# Altium PCB TouchGFX_SmartPCB_SmartPCB_SmartPCB_SmartPCB_SmartPCB_SmartPCB.PcbDoc
Units mm, origin at the board's own origin, x right, y up, seen from the top; angles counter-clockwise.
Board outline 127 x 102.47 mm, 6 copper layers (Top Layer, SIG, POWER, GND, SIG (Mid4), Bottom Layer), stack 1.231 mm thick; 167 components, 192 nets, 780 pads, 4 vias.
Unrouted connection lines stored in the file: 341.
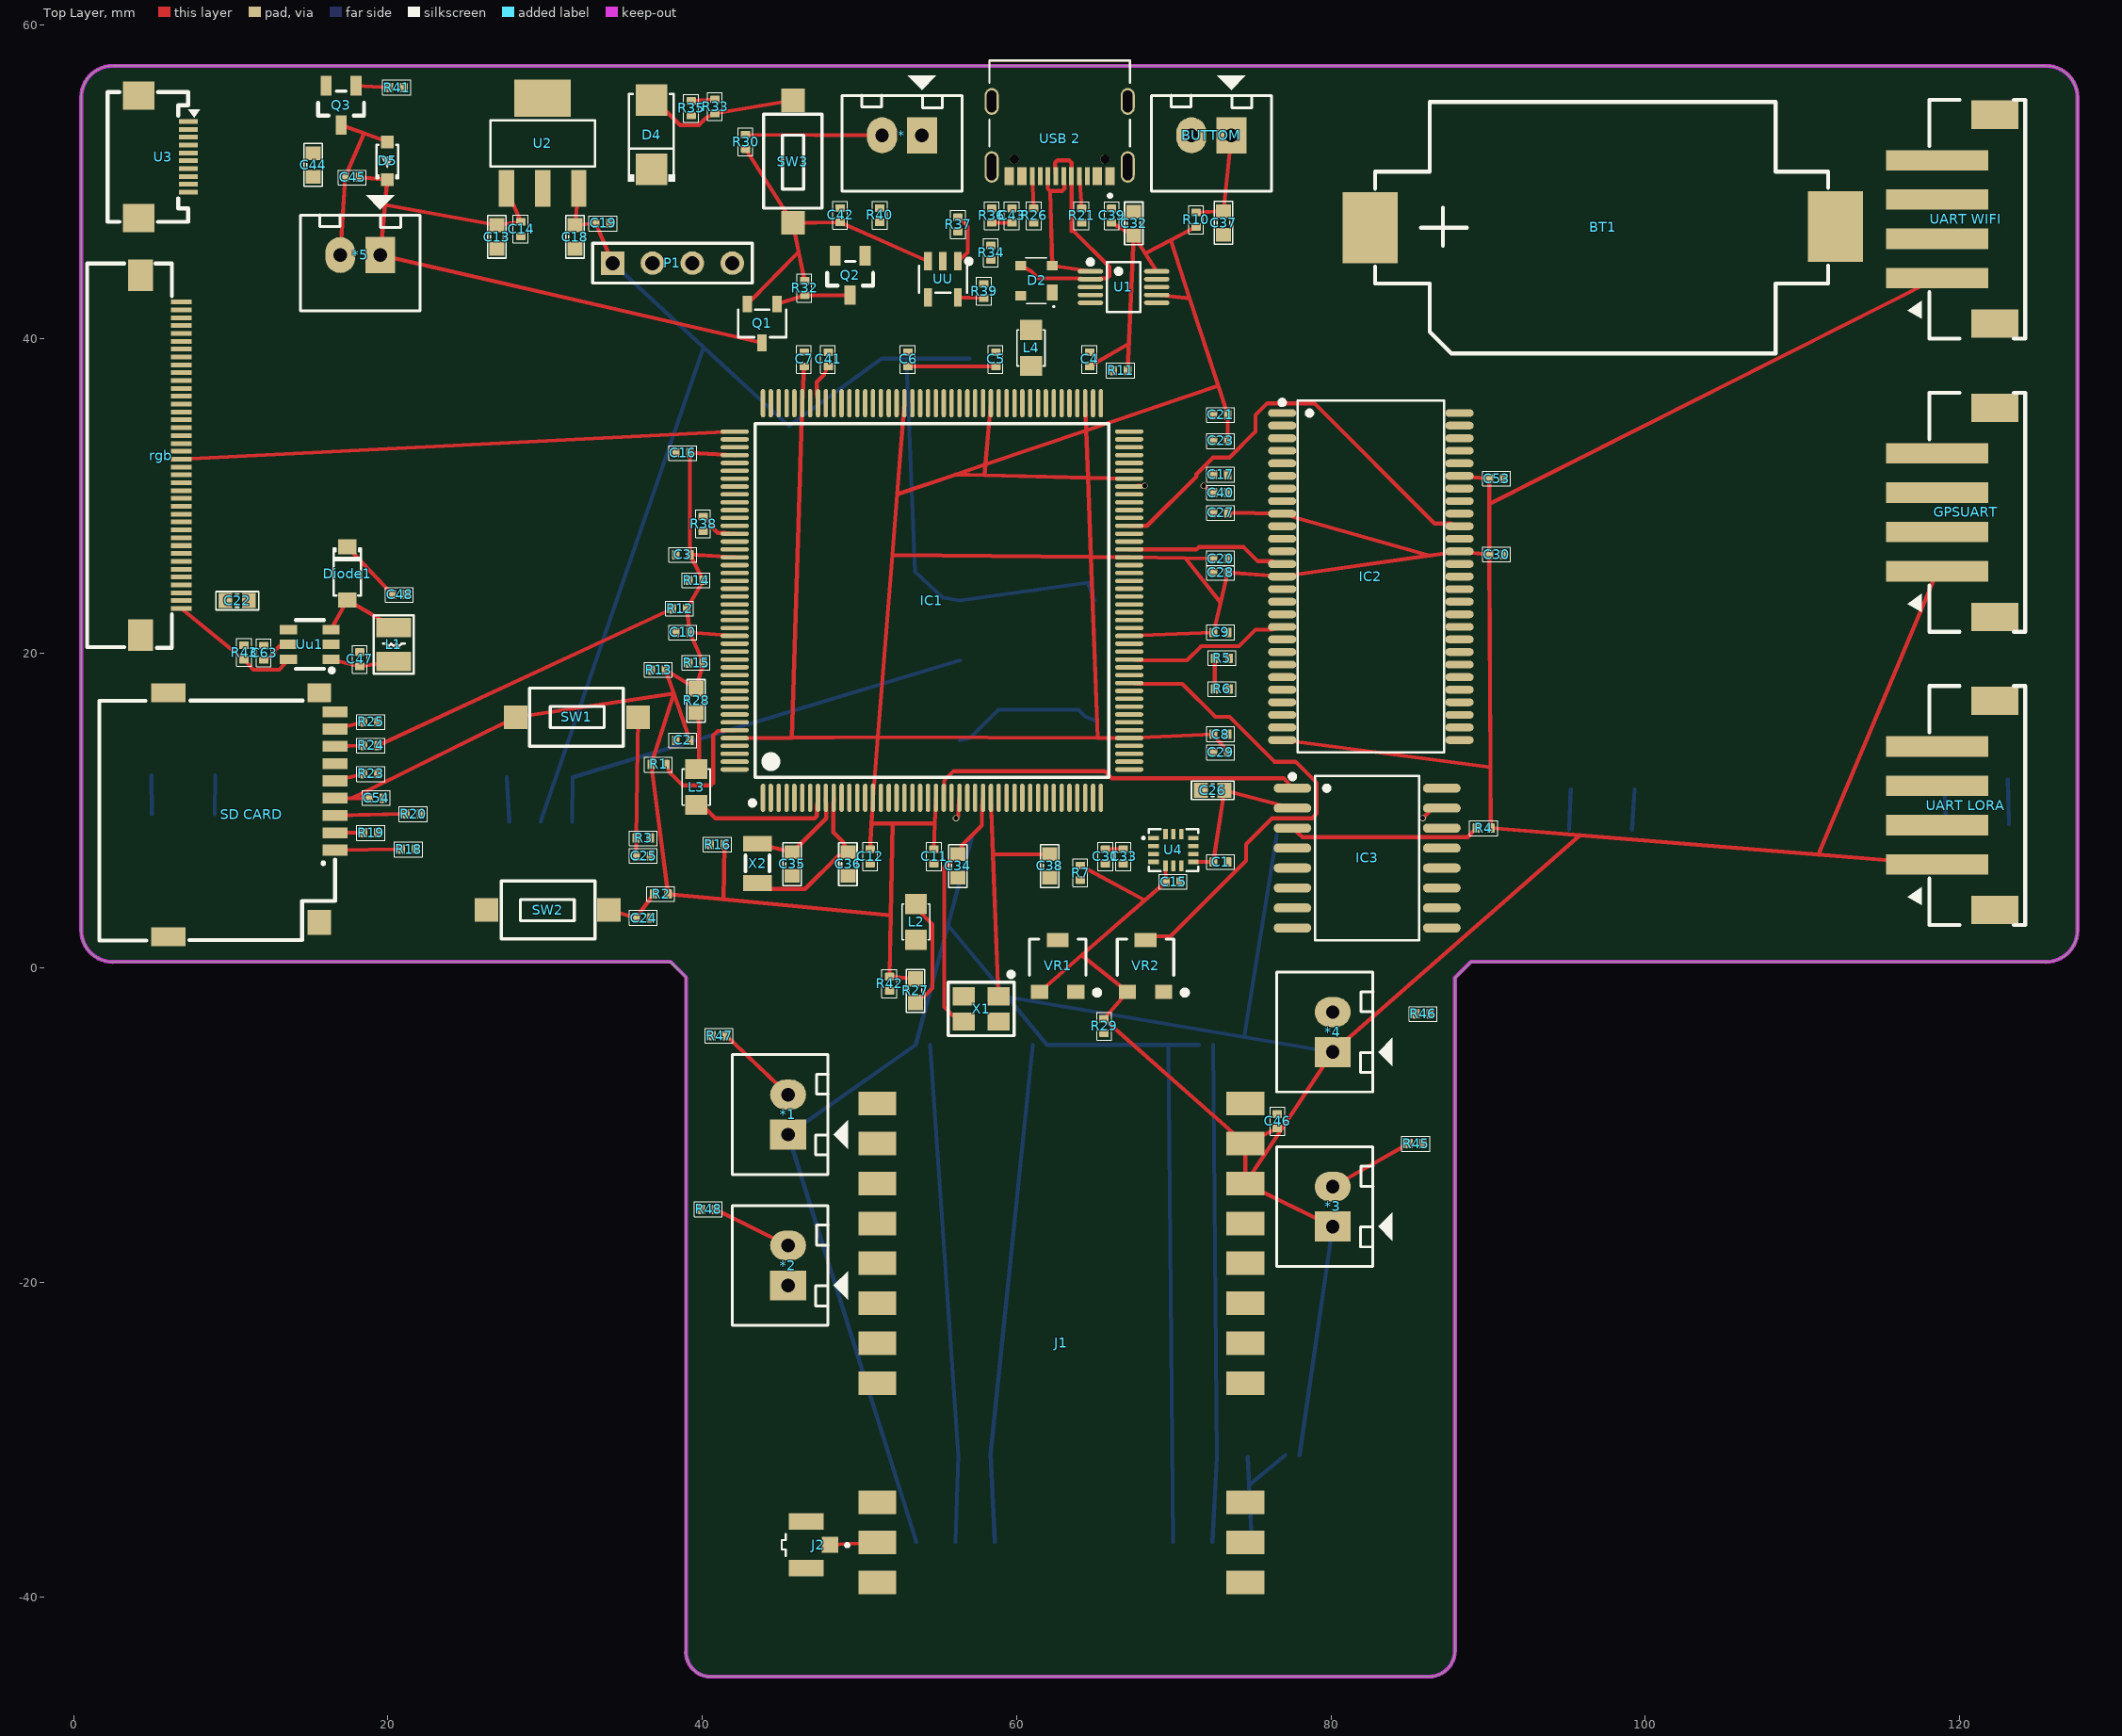
[diagram p0: Top Layer view]
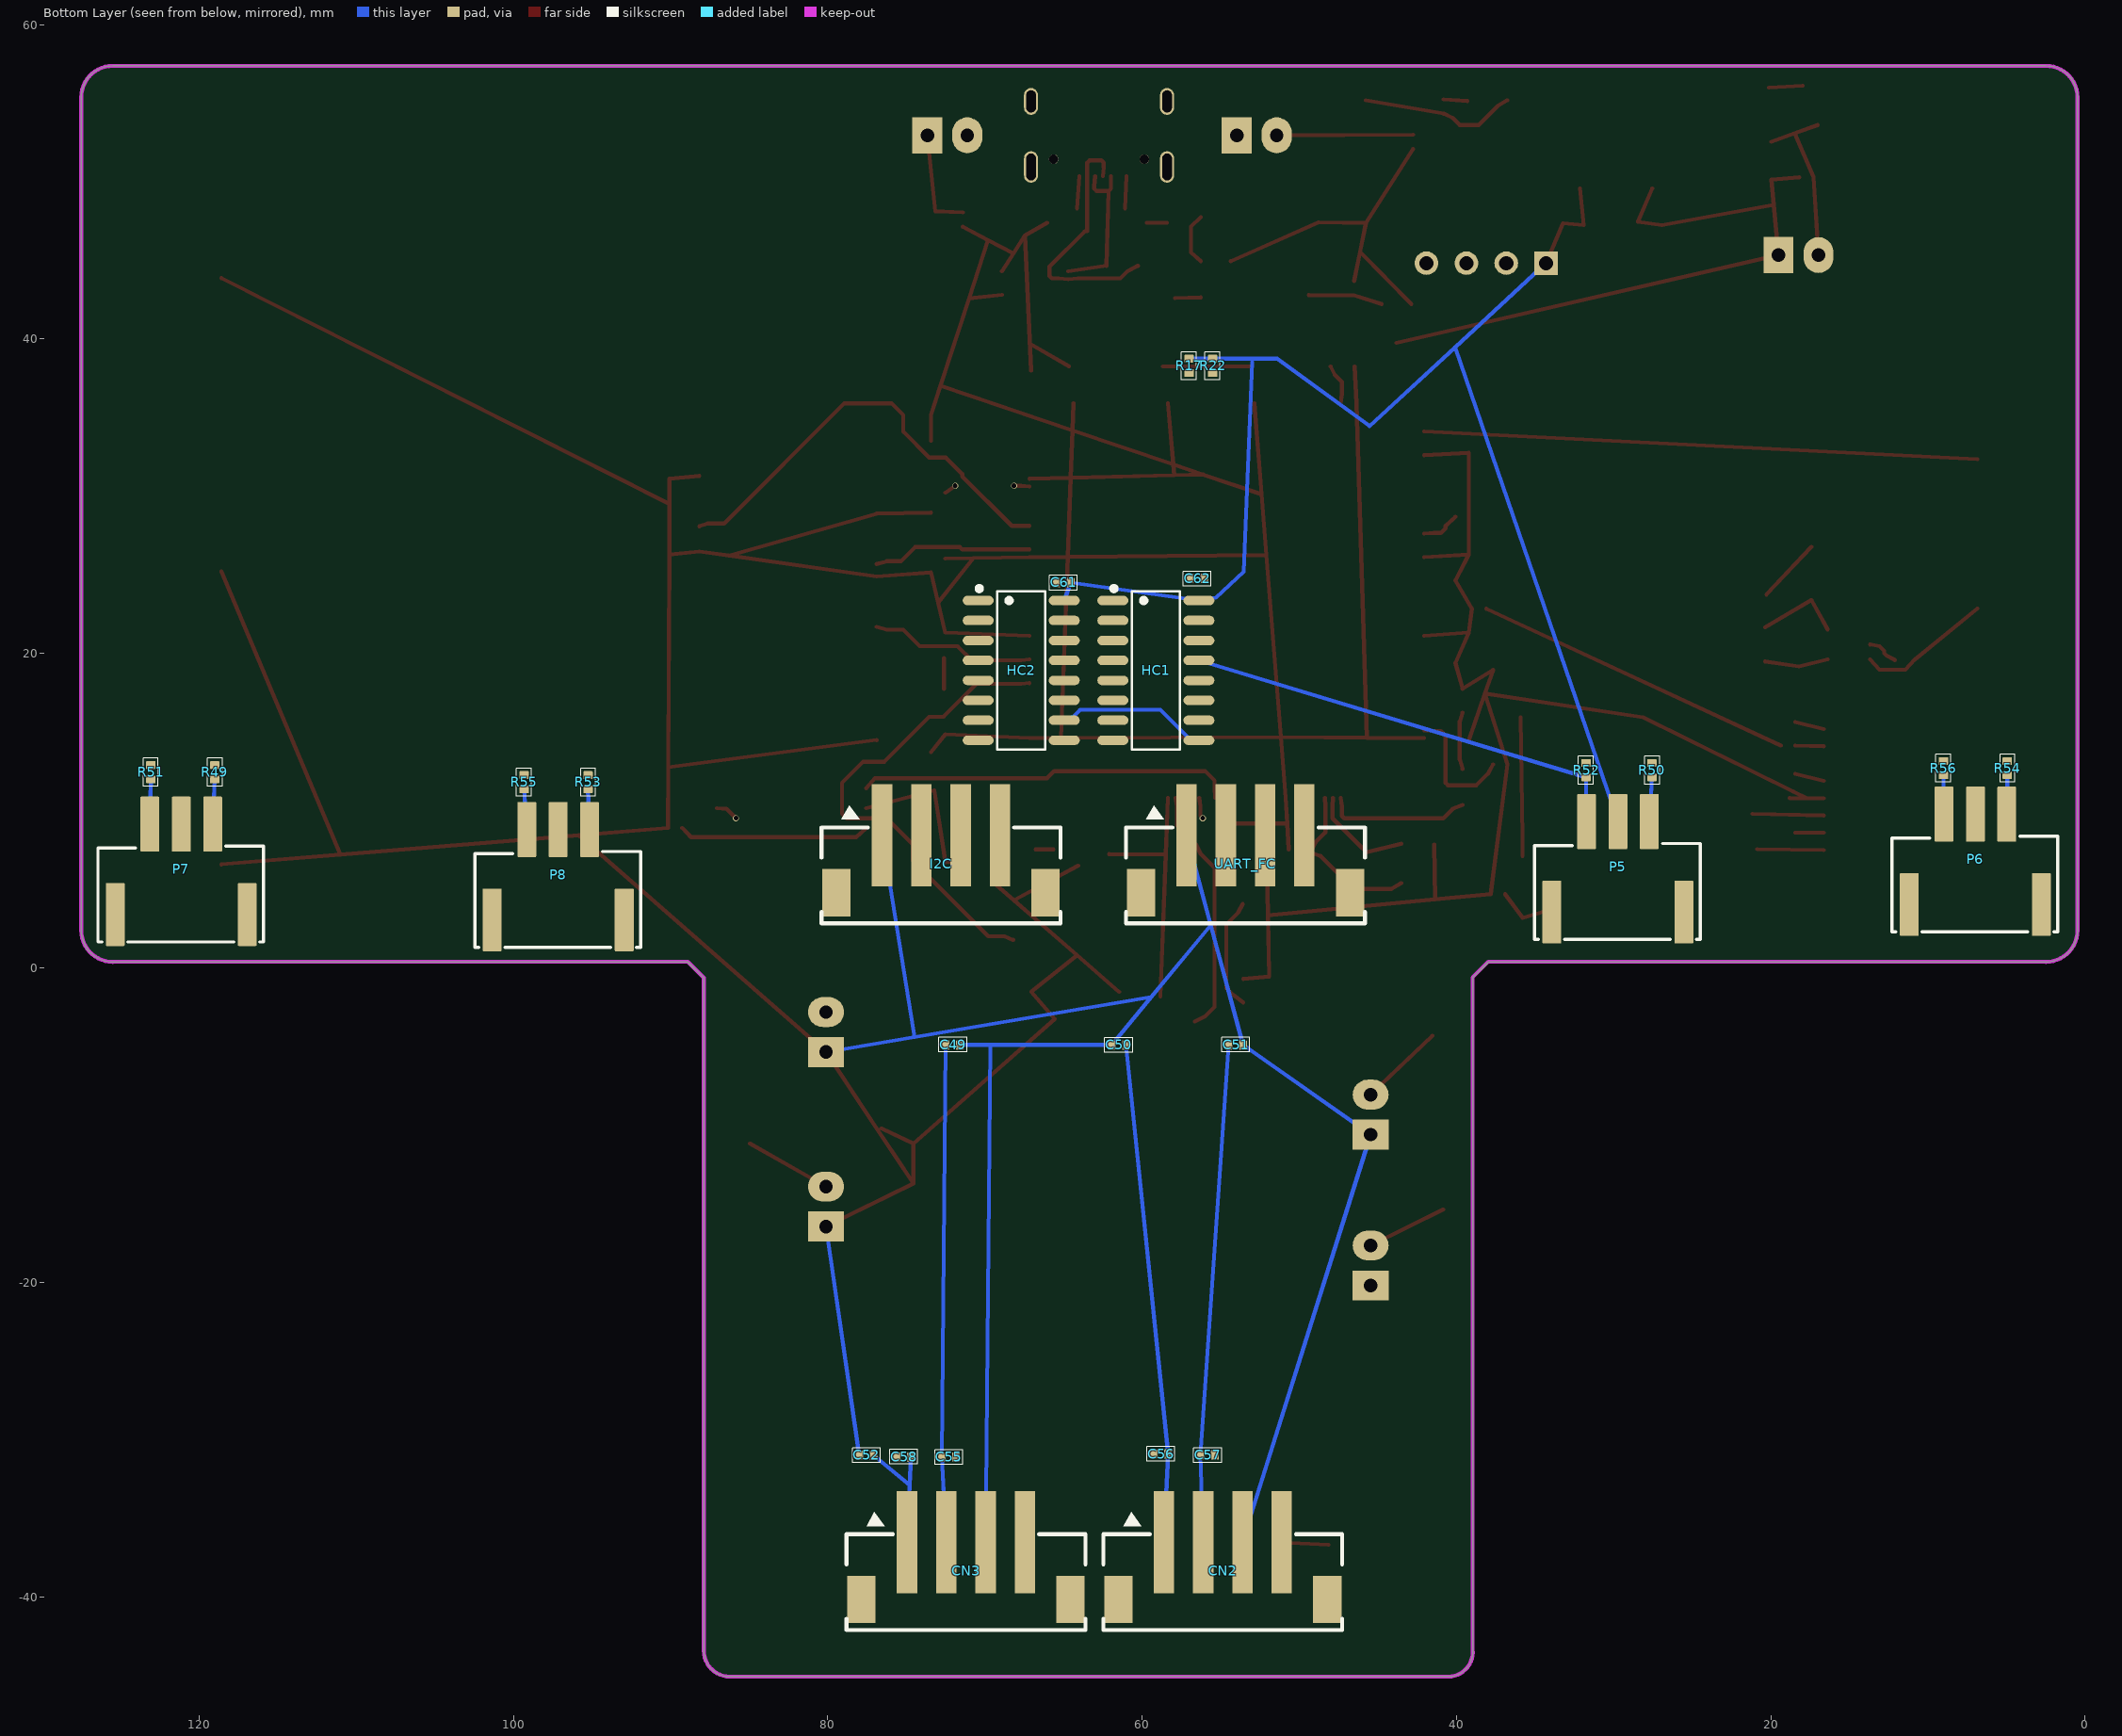
[diagram p1: Bottom Layer view, seen from below]
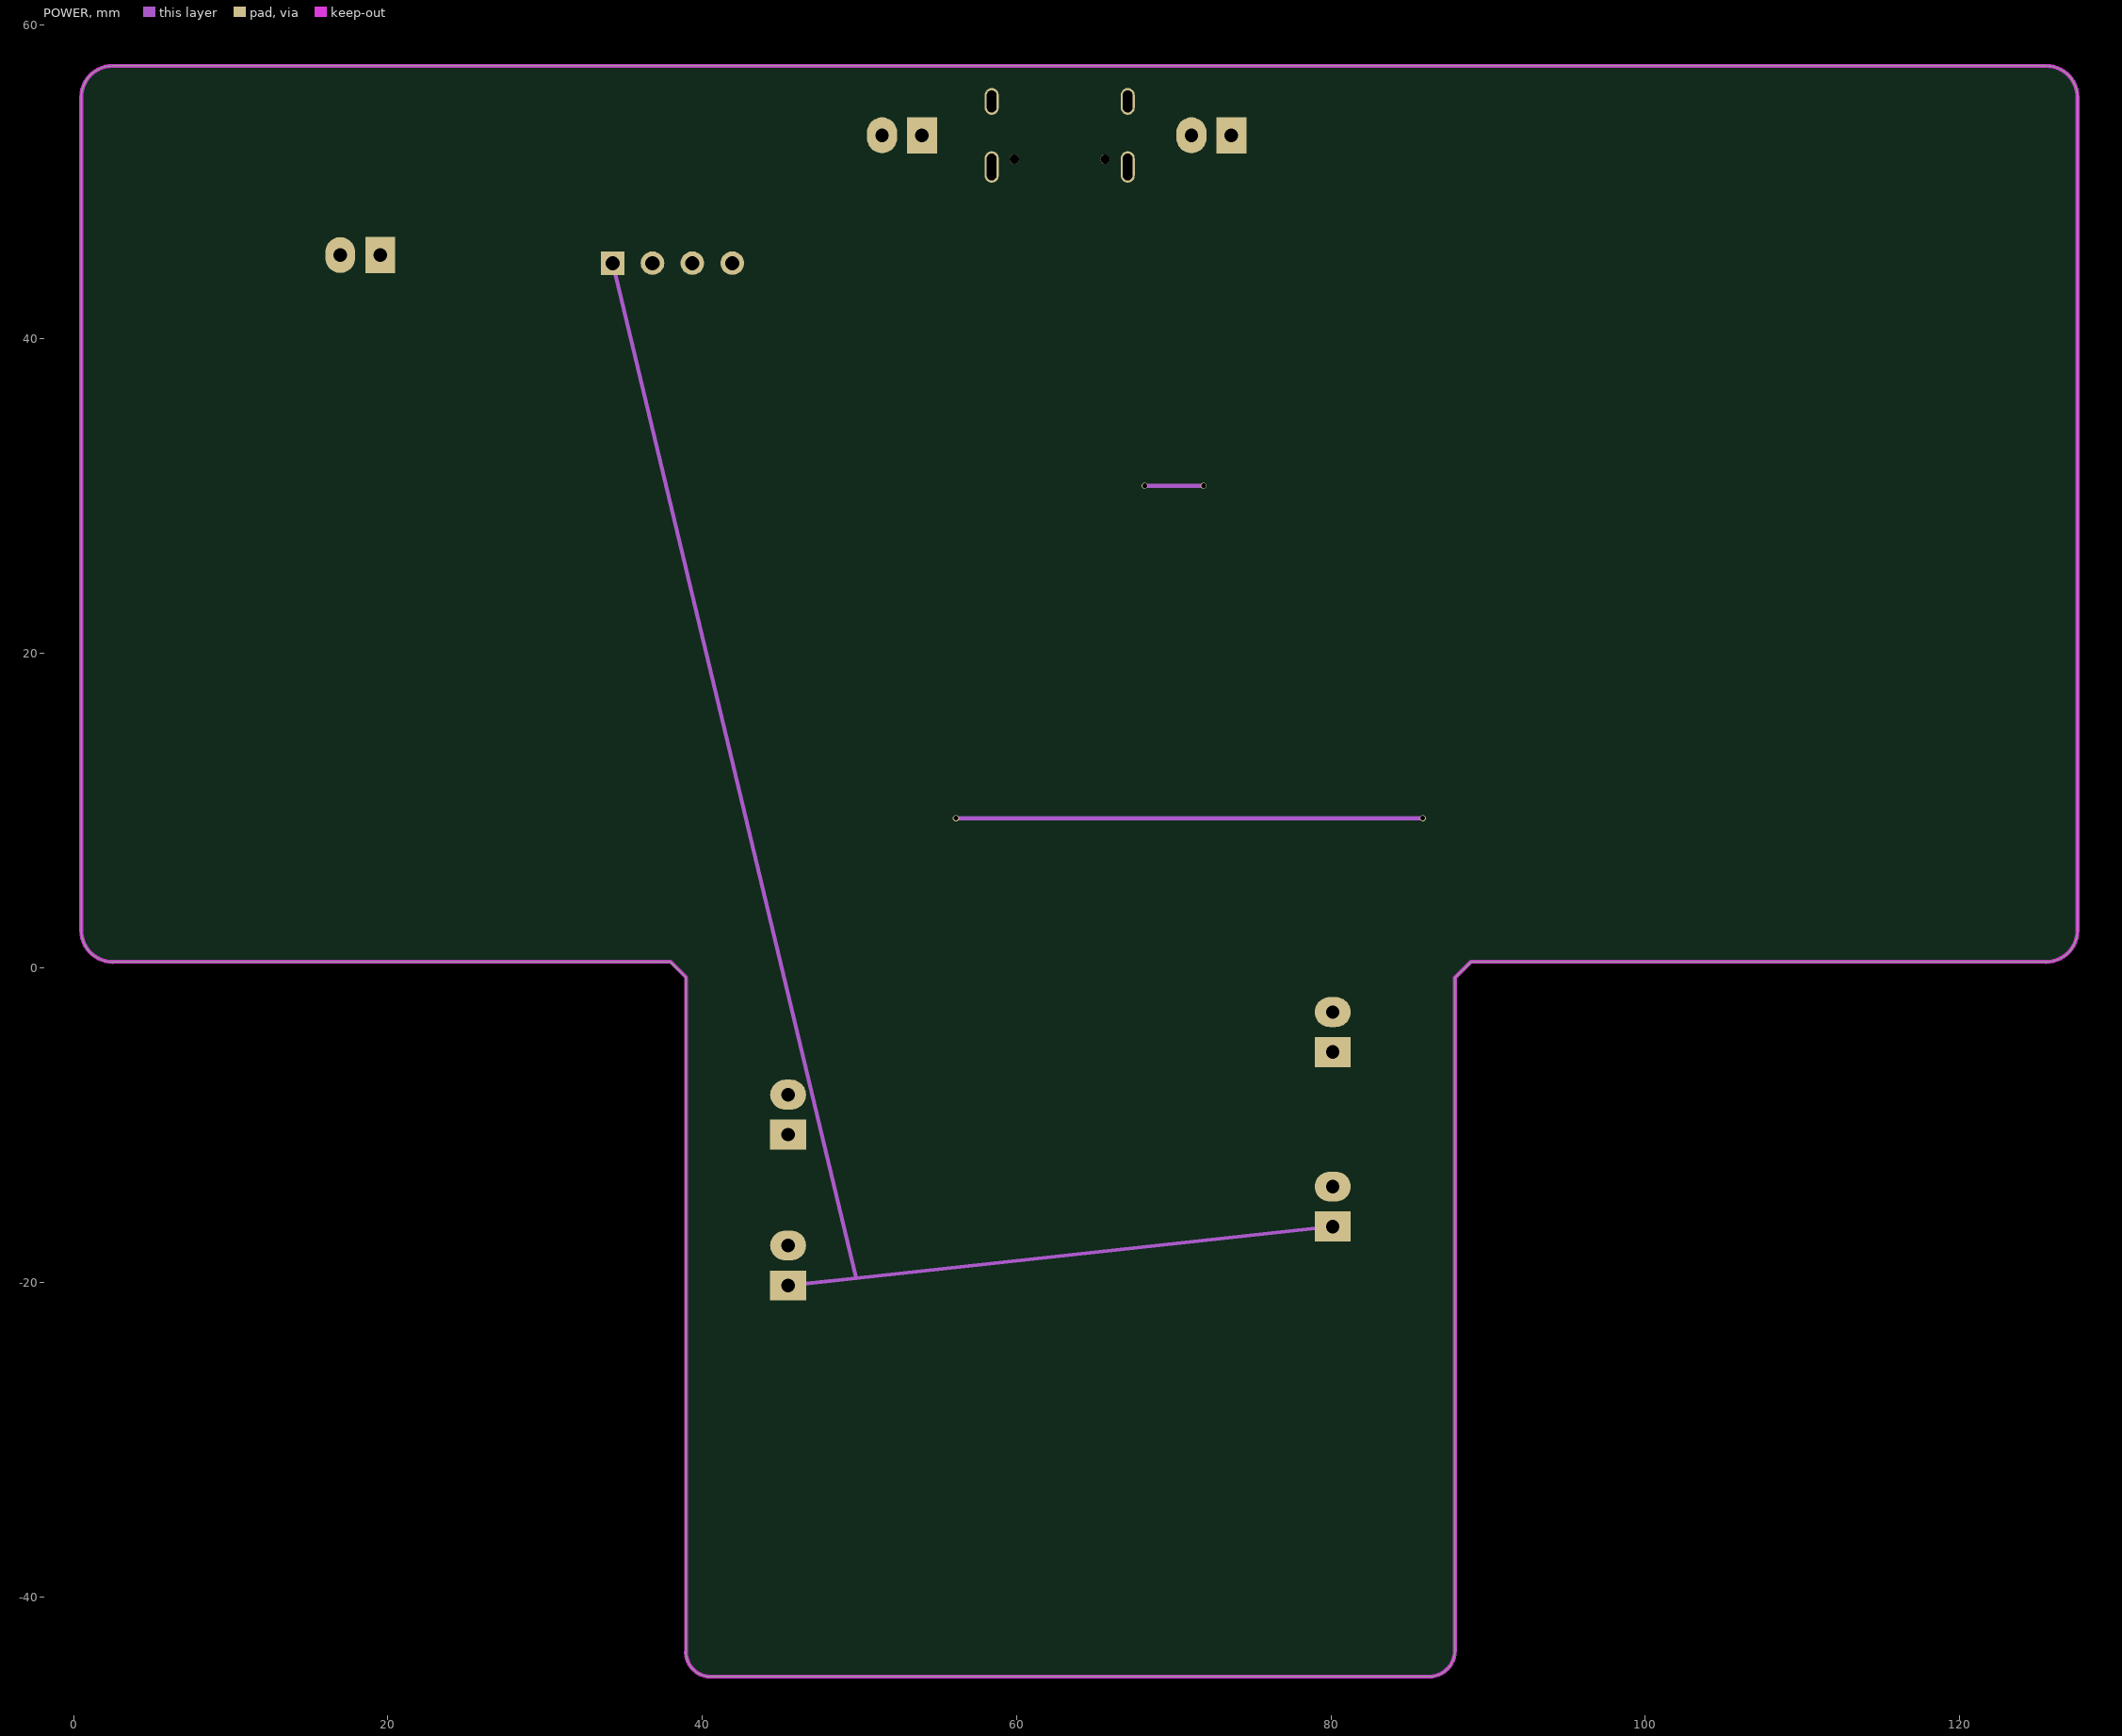
[diagram p2: POWER]

## Layer stack, top to bottom
Top Solder: solder mask 0.0102, Solder Resist, Dk 3.5
Top Layer: signal copper 0.0356
Dielectric 1: core 0.254, FR-4, Dk 4.2
SIG: signal copper 0.036
Dielectric 4: prepreg 0.127, Dk 4.2
POWER: signal copper 0.036
Dielectric 3: core 0.254, Dk 4.2
GND: signal copper 0.036
Dielectric 5: prepreg 0.127, Dk 4.2
SIG (Mid4): signal copper 0.036
Dielectric 2: core 0.254, Dk 4.2
Bottom Layer: signal copper 0.0356
Bottom Solder: solder mask 0.0102, Solder Resist, Dk 3.5

## Board outline
0.489,2.381 ccw(c2.489,2.381) 2.489,0.381 37.973,0.381 38.963,-0.609 38.963,-43.535 ccw(c40.513,-43.535) 40.513,-45.085 86.233,-45.085 ccw(c86.233,-43.434) 87.884,-43.434 87.884,-0.635 88.9,0.381 125.489,0.381 ccw(c125.489,2.381) 127.489,2.381 127.489,55.381 ccw(c125.489,55.381) 125.489,57.381 2.489,57.381 ccw(c2.489,55.381) 0.489,55.381

## Design rules (kind name [scope] priority, off if disabled: settings)
Clearance [All] p1: gap=0.15
PolygonConnect [All] p1: connectstyle=Relief reliefconductorwidth=0.254 reliefentries=4 polygonreliefangle="90 Angle" airgapwidth=0.254
RoutingVias [All] p1: holewidth=0.3 width=0.4 viastyle="Through Hole" minholewidth=0.3 minwidth=0.4 maxholewidth=0 maxwidth=0.4
SolderMaskExpansion [All] p1: expansion=0.102
Width [All] p1: maxlimit=2 minlimit=0.15 preferedwidth=0.254 midlayer3_minwidth=0.254 midlayer3_maxwidth=0.254 midlayer4_minwidth=0.254 midlayer4_maxwidth=0.254 minimp=50.000000 maximp=50.000000 favimp=50.000000
30 further rules are at their usual default settings.

## Components (designator, comment, footprint, x,y, rotation, side; value= is the part's Value field where it differs from the comment)
* "BAT1S" CON2 53.975,52.959 r0 top
*1 "BAT1S" CON2 45.46,-10.605 r270 top
*2 "BAT1S" CON2 45.46,-20.205 r270 top
*3 "BAT1S" CON2 80.11,-16.455 r270 top
*4 "BAT1S" CON2 80.11,-5.355 r270 top
*5 "BAT1S" CON2 19.51,45.345 r0 top
BT1 "PIN2032" BAT-SMD_BS-06-B4AA012 97.282,47.117 r0 top
BUTTOM "BAT1S" CON2 73.66,52.959 r0 top
C1 "100n" "Cap 0402" 72.997,6.731 r0 top
C2 "100n" "Cap 0402" 38.735,14.478 r180 top
C3 "100n" "Cap 0402" 38.735,26.289 r180 top
C4 "100n" "Cap 0402" 64.643,38.735 r90 top
C5 "100n" "Cap 0402" 58.674,38.735 r90 top
C6 "100n" "Cap 0402" 53.086,38.735 r90 top
C7 "100n" "Cap 0402" 46.482,38.735 r90 top
C8 "100n" "Cap 0402" 72.997,14.859 r0 top
C9 "100n" "Cap 0402" 72.997,21.336 r0 top
C10 "100n" "Cap 0402" 38.735,21.336 r180 top
C11 "100n" "Cap 0402" 54.737,7.062 r270 top
C12 "100n" "Cap 0402" 50.673,7.062 r270 top
C13 "22u" "Cap 0603" 26.916,46.502 r90 top
C14 "100n" "Cap 0402" 28.459,47.028 r90 top
C15 "100n" "Cap 0402" 69.977,5.461 r0 top
C16 "100n" "Cap 0402" 38.735,32.766 r180 top
C17 "100n" "Cap 0402" 72.997,31.369 r0 top
C18 "22u" "Cap 0603" 31.888,46.502 r90 top
C19 "100n" "Cap 0402" 33.655,47.371 r180 top
C20 "100n" "Cap 0402" 72.997,26.035 r0 top
C21 "100n" "Cap 0402" 72.947,35.179 r180 top
C22 "10u" "Cap 0603" 10.414,23.368 r0 top
C23 "100n" "Cap 0402" 72.947,33.528 r180 top
C24 "100n" "Cap 0402" 36.273,3.175 r0 top
C25 "100n" "Cap 0402" 36.273,7.112 r0 top
C26 "10u" "Cap 0603" 72.471,11.303 r0 top
C27 "100n" "Cap 0402" 72.947,28.956 r180 top
C28 "100n" "Cap 0402" 72.947,25.146 r180 top
C29 "100n" "Cap 0402" 72.947,13.716 r180 top
C30 "100n" "Cap 0402" 90.551,26.289 r0 top
C31 "2.2u" "Cap 0402" 65.64,7.062 r270 top
C32 "100n" "Cap 0603" 67.437,47.354 r90 top
C33 "100n" "Cap 0402" 66.783,7.062 r270 top
C34 "1u" "Cap 0603" 56.261,6.477 r270 top
C35 "1u" "Cap 0603" 45.72,6.596 r270 top
C36 "1u" "Cap 0603" 49.276,6.596 r270 top
C37 "100n" "Cap 0603" 73.144,47.391 r90 top
C38 "1u" "Cap 0603" 62.103,6.477 r270 top
C39 "?" "Cap 0402" 66.04,47.829 r270 top
C40 "2.2u" "Cap 0402" 72.997,30.226 r0 top
C41 "2.2u" "Cap 0402" 48.006,38.735 r90 top
C42 "100n" "Cap 0402" 48.776,47.904 r90 top
C43 "100n" "Cap 0402" 59.701,47.88 r90 top
C44 "10u" "Cap 0603" 15.232,51.074 r90 top
C45 "100n" "Cap 0402" 17.71,50.295 r180 top
C46 "100n" "Cap 0402" 76.581,-9.779 r270 top
C47 "4.7u" "Cap 0402" 18.206,19.607 r270 top
C48 "2.2uF" "Cap 0402" 20.701,23.749 r180 top
C49 "102" "Cap 0402" 72.01,-4.905 r180 bottom
C50 "102" "Cap 0402" 61.51,-4.905 r0 bottom
C51 "102" "Cap 0402" 54.01,-4.905 r180 bottom
C52 "102" "Cap 0402" 77.56,-31.005 r0 bottom
C53 "100n" "Cap 0402" 90.551,31.115 r0 top
C54 "100n" "Cap 0402" 19.276,10.795 r0 top
C55 "102" "Cap 0402" 72.314,-31.115 r0 bottom
C56 "102" "Cap 0402" 58.773,-30.93 r180 bottom
C57 "102" "Cap 0402" 55.852,-30.988 r0 bottom
C58 "102" "Cap 0402" 75.133,-31.115 r180 bottom
C61 "100n" "Cap 0402" 65.024,24.511 r0 bottom
C62 "100n" "Cap 0402" 56.515,24.765 r0 bottom
C63 "200n" "Cap 0402" 12.11,20.066 r90 top
CN2 "hx 2.54-4p lt" CONN-SMD_4P-P2.50_HX-2.54-4P-LT 54.864,-38.354 r180 bottom
CN3 "hx 2.54-4p lt" CONN-SMD_4P-P2.50_HX-2.54-4P-LT 71.201,-38.354 r180 bottom
D2 "PRTR5V0U2X,215" SOT-143_L2.9-W1.3-P1.92-LS2.3-BR 61.341,43.688 r0 top
D4 "ss34_c8678" SMA_L4.3-W2.6-LS5.2-RD 36.76,52.995 r90 top
D5 "cus10s40.h3f" SOD-323_L1.7-W1.3-LS2.5-RD 19.96,51.345 r90 top
Diode1 "MBR0540T1G" SOD-123_L2.8-W1.8-LS3.7-RD 17.41,25.095 r270 top
GPSUART "hx 2.54-4p lt" CONN-SMD_4P-P2.50_HX-2.54-4P-LT 120.396,28.979 r90 top
HC1 "74hc165d,653" SOIC-16_L9.9-W3.9-P1.27-LS6.0-BL 59.124,18.923 r270 bottom
HC2 "74hc165d,653" SOIC-16_L9.9-W3.9-P1.27-LS6.0-BL 67.691,18.923 r270 bottom
I2C "hx 2.54-4p lt" CONN-SMD_4P-P2.50_HX-2.54-4P-LT 72.791,6.604 r180 bottom
IC1 "STM32H743IIT6" STM32H7 54.61,23.368 r0 top
IC2 "w9825g6kh-6" TSOP-54_L22.2-W10.2-P0.80-LS11.8-BL 82.531,24.892 r270 top
IC3 "w25q256jvfiq" SOIC-16_L10.3-W7.5-P1.27-LS10.3-BL 82.296,6.985 r270 top
J1 "E22-400M30S" E22-400M30S 50.849,-44.556 r0 top
J2 "20279-001E-03" IPEX_20279-001E-03 46.608,-36.703 r90 top
L1 "10uH" INDC2520X10N 20.365,20.574 r90 top
L2 "LED 0805" LED-0805-Yellow 53.594,4.064 r270 top
L3 "LED 0805" LED-0805-Yellow 39.61,12.645 r270 top
L4 "LED 0805" LED-0805-Yellow 60.91,38.295 r90 top
P1 "Header 4" HDR1X4 34.29,44.831 r0 top
P5 "HEADER 3" JST2MM-3P 31.727,9.306 r0 bottom
P6 "HEADER 3" JST2MM-3P 8.985,9.779 r0 bottom
P7 "HEADER 3" JST2MM-3P 123.126,9.142 r0 bottom
P8 "HEADER 3" JST2MM-3P 99.146,8.798 r0 bottom
Q1 "irlml6402trpbf_c2593" SOT-23-3_L2.9-W1.6-P1.90-LS2.8-BR 43.81,40.995 r90 top
Q2 "2n3904s-rtk/ps_c18536" SOT-23-3_L2.9-W1.3-P1.90-LS2.4-TR 49.403,44.045 r90 top
Q3 "2n3904s-rtk/ps_c18536" SOT-23-3_L2.9-W1.3-P1.90-LS2.4-TR 17.018,54.864 r90 top
R1 "4K7" "RES 0402" 37.21,12.945 r180 top
R2 "10k" "RES 0402" 37.36,4.695 r0 top
R3 "10k" "RES 0402" 36.248,8.255 r180 top
R4 "10k" "RES 0402" 89.71,8.895 r180 top
R5 "4k7" "RES 0402" 73.06,19.695 r0 top
R6 "10k" "RES 0402" 73.06,17.745 r180 top
R7 "600ohm" "RES 0402" 64.06,6.045 r90 top
R10 "10k" "RES 0402" 71.41,47.595 r270 top
R11 "4k7" "RES 0402" 66.61,37.995 r0 top
R12 "4k7" "RES 0402" 38.56,22.845 r0 top
R13 "4k7" "RES 0402" 37.21,18.945 r0 top
R14 "4k7" "RES 0402" 39.61,24.645 r0 top
R15 "4k7" "RES 0402" 39.61,19.395 r0 top
R16 "4k7" "RES 0402" 40.96,7.845 r0 top
R17 "10k" "RES 0402" 57.01,38.295 r90 bottom
R18 "20" "RES 0402" 21.31,7.545 r180 top
R19 "20" "RES 0402" 18.91,8.595 r180 top
R20 "20" "RES 0402" 21.61,9.795 r180 top
R21 "20" "RES 0402" 64.135,47.854 r90 top
R22 "10k" "RES 0402" 55.51,38.295 r90 bottom
R23 "20" "RES 0402" 18.91,12.345 r180 top
R24 "20" "RES 0402" 18.91,14.145 r180 top
R25 "20" "RES 0402" 18.91,15.645 r180 top
R26 "20" "RES 0402" 61.087,47.854 r270 top
R27 "5K1" "RES 0603" 53.56,-1.455 r270 top
R28 "5K1" "RES 0603" 39.61,16.995 r270 top
R29 "0ohm" "RES 0402" 65.56,-3.705 r270 top
R30 "0OHM" "RES 0402" 42.76,52.545 r90 top
R32 "4K7" "RES 0402" 46.51,43.245 r90 top
R33 "4K7" "RES 0402" 40.81,54.795 r90 top
R34 "4K7" "RES 0402" 58.36,45.495 r90 top
R35 "4K7" "RES 0402" 39.294,54.684 r90 top
R36 "4K7" "RES 0402" 58.409,47.854 r270 top
R37 "4K7" "RES 0402" 56.26,47.295 r270 top
R38 "4K7" "RES 0402" 40.06,28.245 r90 top
R39 "4K7" "RES 0402" 57.912,43.053 r270 top
R40 "4K7" "RES 0402" 51.285,47.879 r270 top
R41 "4K7" "RES 0402" 20.56,55.995 r0 top
R42 "4K7" "RES 0402" 51.91,-1.005 r90 top
R43 "3.3ohm" "RES 0402" 10.84,20.066 r270 top
R45 "4K7" "RES 0402" 85.397,-11.176 r180 top
R46 "4K7" "RES 0402" 85.852,-2.921 r180 top
R47 "4K7" "RES 0402" 41.074,-4.318 r0 top
R48 "4K7" "RES 0402" 40.386,-15.367 r0 top
R49 "4K7" "RES 0402" 118.999,12.446 r270 bottom
R50 "4K7" "RES 0402" 27.559,12.573 r270 bottom
R51 "4K7" "RES 0402" 123.063,12.446 r90 bottom
R52 "4K7" "RES 0402" 31.75,12.573 r90 bottom
R53 "4K7" "RES 0402" 95.25,11.811 r270 bottom
R54 "4K7" "RES 0402" 4.953,12.7 r270 bottom
R55 "4K7" "RES 0402" 99.314,11.811 r90 bottom
R56 "4K7" "RES 0402" 9.017,12.7 r90 bottom
rgb "FPC_40P" FPC-SMD_P0.50-40P_FGS-XJ-H2.0 5.558,32.61 r90 top
"SD CARD" "TF PUSH" TF-SMD_TF-PUSH 11.336,9.743 r270 top
SW1 "switch" SW-SMD_L6.1-W3.5-LS8.0 32.11,15.945 r180 top
SW2 "switch" SW-SMD_L6.1-W3.5-LS8.0 30.08,3.683 r0 top
SW3 "switch" SW-SMD_L6.1-W3.5-LS8.0 45.76,51.195 r90 top
U1 "CH340E" MSOP-10 66.802,43.307 r270 top
U2 "mcp1826s-3302e/db" SOT-223-3_L6.7-W3.7-P2.30-LS7.0-BR 29.845,52.451 r270 top
U3 "fpc 0.5-10p hyh2.0" FPC-SMD_10P-P0.50_FPC-0.5-10P-HYH2.0 5.715,51.59 r270 top
U4 "bmi260" LGA-14_L3.0-W2.5-P0.50-TL 69.977,7.493 r0 top
"UART LORA" "hx 2.54-4p lt" CONN-SMD_4P-P2.50_HX-2.54-4P-LT 120.396,10.333 r90 top
"UART WIFI" "hx 2.54-4p lt" CONN-SMD_4P-P2.50_HX-2.54-4P-LT 120.396,47.625 r90 top
UART_FC "hx 2.54-4p lt" CONN-SMD_4P-P2.50_HX-2.54-4P-LT 53.424,6.604 r180 bottom
"USB 2" "USB_TYPE-C-31-M-12_1" HRO_TYPE-C-31-M-12 62.738,55.118 r180 top
UU "LTC4054ES5-4.2" SACPIN 55.306,43.804 r180 top
Uu1 "TPS61165DBVR" SOT-23-6_L2.9-W1.6-P0.95-LS2.8-BR 15.031,20.574 r0 top
VR1 "PVG3A200C01R00" TRIM_PVG3A200C01R00 62.611,0.127 r0 top
VR2 "PVG3A200C01R00" TRIM_PVG3A200C01R00 68.199,0.127 r0 top
X1 "25MHz" CRYSTAL-SMD_4P-L3.2-W2.5-BL 57.76,-2.655 r180 top
X2 "q13fc13500004_c32346" FC-135R_L3.2-W1.5 43.51,6.645 r90 top

## Footprints (in the part's own frame and the unit in brackets; to place one, negate y for a bottom-side part, rotate by r counter-clockwise, add the part's x,y. Pads: shape width x height; smd on the part's side, far side on the other; paste and mask are expansions set on the pad)
BAT-SMD_BS-06-B4AA012 [mm]
  rect 3.5x4.501 smd: 1(-14.801,-0.03) 2(14.798,0.033)
  silkscreen extent -14.48,-8.03 14.35,7.97, body extent -16.03,-9.65 16.29,9.4, height 6.02
"Cap 0402" [mm]
  rrect20% 0.49x0.6 smd: 1(-0.48,0) 2(0.43,0)
  silkscreen extent -0.91,-0.46 0.86,0.48, body extent -0.53,-0.25 0.47,0.25, height 0.5
"Cap 0603" [mm]
  rect 0.889x0.95 smd mask+0.076: 1(-0.758,-0.008) 2(0.742,-0.008)
  silkscreen extent -1.35,-0.59 1.36,0.58, body extent -0.77,-0.41 0.83,0.39, height 0.78
CON2 [mil] "CON2"
  rect 75x90 hole 34: 1(0,0)
  oval 75x90 hole 34: 2(-100,0)
  silkscreen extent -200,-140 100,150, body extent -168,-107 68,70, height 236
CONN-SMD_4P-P2.50_HX-2.54-4P-LT [mm]
  rect 1.3x6.5 smd paste+0 mask+0.051: 1(-3.749,1.826) 2(-1.25,1.826) 3(1.25,1.826) 4(3.749,1.826)
  rect 1.801x3 smd paste+0 mask+0.051: 5(6.65,-1.824) 6(-6.65,-1.824)
  silkscreen extent -7.6,-3.77 7.6,3.72, body extent -7.37,-6.14 7.63,3.86, height 6.12
CRYSTAL-SMD_4P-L3.2-W2.5-BL [mm]
  rect 1.4x1.15 smd: 1(-1.082,-0.838) 2(1.118,-0.838) 3(1.118,0.762) 4(-1.082,0.762)
  silkscreen extent -2.08,-2.39 2.12,1.66, body extent -1.58,-1.29 1.62,1.21, height 0.61
E22-400M30S [mm]
  rect 2.4x1.5 smd: 1-GND(23.7,5.46) 2-GND(23.7,8) 3-GND(23.7,10.54) 4-GND(23.7,18.14) 5-GND(23.7,20.68) 6-RXEN(23.7,23.22) 7-TXEN(23.7,25.76) 8-DIO2(23.7,28.3) 9-VCC(23.7,30.84) 10-VCC(23.7,33.38) 11-GND(23.7,35.92) 12-GND(0.3,35.92) 13-DIO1(0.3,33.38) 14-BUSY(0.3,30.84) 15-NRESET(0.3,28.3) 16-MISO(0.3,25.76) 17-MOSI(0.3,23.22) 18-SCK(0.3,20.68) 19-NSS(0.3,18.14) 20-GND(0.3,10.54) 21-ANT(0.3,8) 22-GND(0.3,5.46)
  body extent -0.06,-0.02 23.94,38.48, height 3.97
FC-135R_L3.2-W1.5 [mm]
  rect 1.001x1.801 smd: 1(-1.252,0) 2(1.25,0)
  silkscreen extent -0.51,-0.76 0.51,0.76, body extent -1.6,-0.75 1.6,0.75, height 0.65
FPC-SMD_10P-P0.50_FPC-0.5-10P-HYH2.0 [mil]
  rect 11.8x47.2 smd paste+0 mask+2: 1(-88.6,62) 2(-68.9,62) 3(-49.2,62) 4(-29.5,62) 5(-9.9,62) 6(9.8,62) 7(29.5,62) 8(49.2,62) 9(68.9,62) 10(88.6,62)
  rect 70.9x78.7 smd paste+0 mask+2: 11(153.5,-62) 12(-153.6,-62)
  silkscreen extent -162,-140 162,92, body extent -138,-85 138,65, height 43
FPC-SMD_P0.50-40P_FGS-XJ-H2.0 [mm]
  rect 0.3x1.3 smd paste+0 mask+0.05: 1(-9.75,-1.3) 2(-9.25,-1.3) 3(-8.75,-1.3) 4(-8.25,-1.3) 5(-7.75,-1.3) 6(-7.25,-1.3) 7(-6.75,-1.3) 8(-6.25,-1.3) 9(-5.75,-1.3) 10(-5.25,-1.3) 11(-4.75,-1.3) 12(-4.25,-1.3) 13(-3.75,-1.3) 14(-3.25,-1.3) 15(-2.75,-1.3) 16(-2.25,-1.3) 17(-1.75,-1.3) 18(-1.25,-1.3) 19(-0.75,-1.3) 20(-0.25,-1.3) 21(0.25,-1.3) 22(0.75,-1.3) 23(1.25,-1.3) 24(1.75,-1.3) 25(2.25,-1.3) 26(2.75,-1.3) 27(3.25,-1.3) 28(3.75,-1.3) 29(4.25,-1.3) 30(4.75,-1.3) 31(5.25,-1.3) 32(5.75,-1.3) 33(6.25,-1.3) 34(6.75,-1.3) 35(7.25,-1.3) 36(7.75,-1.3) 37(8.25,-1.3) 38(8.75,-1.3) 39(9.25,-1.3) 40(9.75,-1.3)
  rect 2x1.6 smd: 41(11.45,1.3) 42(-11.45,1.3)
  silkscreen extent -12.25,-0.7 12.2,4.7, body extent -12.03,-2.64 12.03,3.3, height 2.63
HDR1X4 [mm] "Connector; Header; 4 Position"
  rect 1.5x1.5 hole 0.9: 1(0,0)
  round 1.5 hole 0.9: 2(2.54,0) 3(5.08,0) 4(7.62,0)
  silkscreen extent -1.27,-1.27 8.89,1.27
HRO_TYPE-C-31-M-12 [mm]
  rect 0.6x1.14 smd mask+0.05: A1_B12(-3.2,4.75) A4_B9(-2.4,4.75) B1_A12(3.2,4.75) B4_A9(2.4,4.75)
  rect 0.3x1.14 smd mask+0.05: A5(-1.25,4.75) A6(-0.25,4.75) A7(0.25,4.75) A8(1.25,4.75) B5(1.75,4.75) B6(0.75,4.75) B7(-0.75,4.75) B8(-1.75,4.75)
  oval 0.9x2 hole 0.6 slot 1.7 at 90 deg: S1(-4.325,4.17) S2(4.325,4.17)
  oval 0.9x1.7 hole 0.6 slot 1.4 at 90 deg: S3(-4.325,0) S4(4.325,0)
  round 0.6 hole 0.6 unplated: ""(-2.89,3.68) ""(2.89,3.68)
  silkscreen extent -4.47,-2.6 4.47,6.1, body extent -4.47,-2.6 4.47,5.31, height 3.31
INDC2520X10N [mm]
  rect 1.23x2.22 smd: 1(-1.085,0) 2(1.085,0)
  Top Layer pour cut-out: -0.475,-1.225 -0.475,1.225 0.475,1.225 0.475,-1.225
  silkscreen extent -1.85,-1.27 1.85,1.27, body extent -1.35,-1.1 1.35,1.1, height 1
IPEX_20279-001E-03 [mm]
  rect 1x1.05 smd: 1(0,-1.525)
  rect 1.05x2.2 smd: 2(1.475,0) 3(-1.475,0)
  silkscreen extent -0.7,-2.71 0.7,1.55, body extent -1.5,-1.55 1.5,1.55, height 1.25
JST2MM-3P [mm] "JST2mm-3P"
  rrect10% 1.2x3.5 smd: 1(0,0) 2(-2,0) 3(-4,0)
  rrect10% 1.2x4 smd: 4(2.2,5.75) 5(-6.2,5.75)
  silkscreen extent -7.24,1.4 3.3,7.49, body extent -7.16,1.44 3.34,7.44, height 6.01
LED-0805-Yellow [mil]
  rect 50x55 smd: 1(0,0) 2(90,0)
  silkscreen extent 0,-35 90,35, body extent 5,-25 85,25, height 43
LGA-14_L3.0-W2.5-P0.50-TL [mil]
  rect 26.6x11 smd: 1(-49.7,29.6) 2(-49.7,9.9) 3(-49.7,-9.8) 4(-49.7,-29.5) 8(49.6,-29.5) 9(49.6,-9.8) 10(49.6,9.9) 11(49.6,29.6)
  rect 11x26.6 smd: 5(-19.7,-39.8) 6(-0.1,-39.8) 7(19.6,-39.8) 12(19.6,39.9) 13(-0.1,39.9) 14(-19.7,39.9)
  silkscreen extent -78,-52 62,52, body extent -59,-49 59,49, height 34
MSOP-10 [mm]
  oval 0.28x1.62 smd: 1(-1,-2.11) 2(-0.5,-2.11) 3(0,-2.11) 4(0.5,-2.11) 5(1,-2.11) 6(1,2.11) 7(0.5,2.11) 8(0,2.11) 9(-0.5,2.11) 10(-1,2.11)
  silkscreen extent -1.74,-2.26 1.58,1.07, body extent -1.5,-2.5 1.5,2.5, height 1.1
"RES 0402" [mm]
  rrect20% 0.49x0.6 smd: 1(-0.455,0) 2(0.455,0)
  silkscreen extent -0.89,-0.46 0.89,0.48, body extent -0.47,-0.25 0.53,0.25, height 0.32
"RES 0603" [mm] "RES 0603"
  rect 1x0.95 smd mask+0.076: 1(-0.75,0) 2(0.75,0)
  silkscreen extent -1.35,-0.58 1.37,0.58, body extent -0.8,-0.4 0.8,0.4, height 0.45
SACPIN [mm]
  rect 0.49x1.157 smd paste+0 mask+0.051: 1(-0.95,-1.154) 2(0,-1.154) 3(0.95,-1.154)
  rect 0.49x1.175 smd paste+0 mask+0.051: 4(0.95,1.154) 5(-0.95,1.154)
  silkscreen extent -1.8,-1.29 1.53,0.85, body extent -1.45,-1.53 1.45,1.27, height 1.2
SMA_L4.3-W2.6-LS5.2-RD [mm]
  rect 1.999x1.999 smd: 1(-2.2,0) 2(2.2,0)
  silkscreen extent -2.98,-1.5 2.6,1.5, body extent -2.57,-1.28 2.57,1.28, height 2.5
SOD-123_L2.8-W1.8-LS3.7-RD [mm]
  rect 0.95x1.15 smd paste+0 mask+0.051: 1(-1.693,0) 2(1.693,0)
  silkscreen extent -1.58,-0.87 1.41,0.87, body extent -1.84,-0.8 1.84,0.8, height 1.35
SOD-323_L1.7-W1.3-LS2.5-RD [mil]
  rect 31.5x31.5 smd: 1(-47.3,0) 2(47.2,0)
  silkscreen extent -43,-28 39,28, body extent -49,-25 49,25, height 46
SOIC-16_L9.9-W3.9-P1.27-LS6.0-BL [mm]
  oval 0.602x1.971 smd: 1(-4.445,-2.736) 2(-3.175,-2.736) 3(-1.905,-2.736) 4(-0.635,-2.736) 5(0.635,-2.736) 6(1.905,-2.736) 7(3.175,-2.736) 8(4.445,-2.736) 9(4.445,2.736) 10(3.175,2.736) 11(1.905,2.736) 12(0.635,2.736) 13(-0.635,2.736) 14(-1.905,2.736) 15(-3.175,2.736) 16(-4.445,2.736)
  silkscreen extent -5.36,-2.81 5.03,1.52, body extent -4.95,-3.13 4.95,2.87, height 1.75
SOIC-16_L10.3-W7.5-P1.27-LS10.3-BL [mil]
  oval 22.6x94.5 smd: 1(-175,-187) 2(-125,-187) 3(-75,-187) 4(-25,-187) 5(25,-187) 6(75,-187) 7(125,-187) 8(175,-187) 9(175,187) 10(125,187) 11(75,187) 12(25,187) 13(-25,187) 14(-75,187) 15(-125,187) 16(-175,187)
  silkscreen extent -210,-193 206,131, body extent -203,-203 203,203, height 104
SOT-23-3_L2.9-W1.3-P1.90-LS2.4-TR [mm]
  rect 1.25x0.701 smd: 1(1.25,0.95) 2(1.25,-0.95) 3(-1.25,0)
  silkscreen extent -0.65,-1.46 0.9,1.46, body extent -1.2,-1.48 1.2,1.42, height 0.95
SOT-23-3_L2.9-W1.6-P1.90-LS2.8-BR [mm]
  rect 1.069x0.599 smd paste+0 mask+0.051: 1(1.234,-0.95) 2(1.234,0.95) 3(-1.234,0)
  silkscreen extent -0.88,-1.54 0.88,1.54, body extent -1.2,-1.48 1.2,1.42, height 0.95
SOT-23-6_L2.9-W1.6-P0.95-LS2.8-BR [mm]
  rect 1.1x0.6 smd paste+0 mask+0.051: 1(1.35,-0.95) 2(1.35,0) 3(1.35,0.95) 4(-1.35,0.95) 5(-1.35,0) 6(-1.35,-0.95)
  silkscreen extent -0.9,-1.78 1.52,1.55, body extent -1.4,-1.45 1.4,1.45, height 1.45
SOT-143_L2.9-W1.3-P1.92-LS2.3-BR [mm]
  rect 0.7x1 smd: 1(0.924,-0.725)
  rect 0.7x0.6 smd: 2(0.924,0.975) 3(-1.076,0.975) 4(-1.076,-0.925)
  silkscreen extent -0.78,-1.67 1.07,1.48, body extent -1.28,-1.44 1.12,1.46, height 0.95
SOT-223-3_L6.7-W3.7-P2.30-LS7.0-BR [mil]
  rect 92.1x38.6 smd: 1(112.9,-90.6) 2(112.9,0) 3(112.9,90.5)
  rect 92.1x141.7 smd: 4(-113,0)
  silkscreen extent -58,-131 58,131, body extent -133,-128 143,128, height 71
STM32H7 [mm]
  oval 0.28x1.8 smd paste+0 mask+0.051: 1(-10.75,-12.55) 2(-10.25,-12.55) 3(-9.75,-12.55) 4(-9.25,-12.55) 5(-8.75,-12.55) 6(-8.25,-12.55) 7(-7.75,-12.55) 8(-7.25,-12.55) 9(-6.75,-12.55) 10(-6.25,-12.55) 11(-5.75,-12.55) 12(-5.25,-12.55) 13(-4.75,-12.55) 14(-4.25,-12.55) 15(-3.75,-12.55) 16(-3.25,-12.55) 17(-2.75,-12.55) 18(-2.25,-12.55) 19(-1.75,-12.55) 20(-1.25,-12.55) 21(-0.75,-12.55) 22(-0.25,-12.55) 23(0.25,-12.55) 24(0.75,-12.55) 25(1.25,-12.55) 26(1.75,-12.55) 27(2.25,-12.55) 28(2.75,-12.55) 29(3.25,-12.55) 30(3.75,-12.55) 31(4.25,-12.55) 32(4.75,-12.55) 33(5.25,-12.55) 34(5.75,-12.55) 35(6.25,-12.55) 36(6.75,-12.55) 37(7.25,-12.55) 38(7.75,-12.55) 39(8.25,-12.55) 40(8.75,-12.55) 41(9.25,-12.55) 42(9.75,-12.55) 43(10.25,-12.55) 44(10.75,-12.55) 89(10.75,12.55) 90(10.25,12.55) 91(9.75,12.55) 92(9.25,12.55) 93(8.75,12.55) 94(8.25,12.55) 95(7.75,12.55) 96(7.25,12.55) 97(6.75,12.55) 98(6.25,12.55) 99(5.75,12.55) 100(5.25,12.55) 101(4.75,12.55) 102(4.25,12.55) 103(3.75,12.55) 104(3.25,12.55) 105(2.75,12.55) 106(2.25,12.55) 107(1.75,12.55) 108(1.25,12.55) 109(0.75,12.55) 110(0.25,12.55) 111(-0.25,12.55) 112(-0.75,12.55) 113(-1.25,12.55) 114(-1.75,12.55) 115(-2.25,12.55) 116(-2.75,12.55) 117(-3.25,12.55) 118(-3.75,12.55) 119(-4.25,12.55) 120(-4.75,12.55) 121(-5.25,12.55) 122(-5.75,12.55) 123(-6.25,12.55) 124(-6.75,12.55) 125(-7.25,12.55) 126(-7.75,12.55) 127(-8.25,12.55) 128(-8.75,12.55) 129(-9.25,12.55) 130(-9.75,12.55) 131(-10.25,12.55) 132(-10.75,12.55)
  oval 1.8x0.28 smd paste+0 mask+0.051: 45(12.55,-10.75) 46(12.55,-10.25) 47(12.55,-9.75) 48(12.55,-9.25) 49(12.55,-8.75) 50(12.55,-8.25) 51(12.55,-7.75) 52(12.55,-7.25) 53(12.55,-6.75) 54(12.55,-6.25) 55(12.55,-5.75) 56(12.55,-5.25) 57(12.55,-4.75) 58(12.55,-4.25) 59(12.55,-3.75) 60(12.55,-3.25) 61(12.55,-2.75) 62(12.55,-2.25) 63(12.55,-1.75) 64(12.55,-1.25) 65(12.55,-0.75) 66(12.55,-0.25) 67(12.55,0.25) 68(12.55,0.75) 69(12.55,1.25) 70(12.55,1.75) 71(12.55,2.25) 72(12.55,2.75) 73(12.55,3.25) 74(12.55,3.75) 75(12.55,4.25) 76(12.55,4.75) 77(12.55,5.25) 78(12.55,5.75) 79(12.55,6.25) 80(12.55,6.75) 81(12.55,7.25) 82(12.55,7.75) 83(12.55,8.25) 84(12.55,8.75) 85(12.55,9.25) 86(12.55,9.75) 87(12.55,10.25) 88(12.55,10.75) 133(-12.55,10.75) 134(-12.55,10.25) 135(-12.55,9.75) 136(-12.55,9.25) 137(-12.55,8.75) 138(-12.55,8.25) 139(-12.55,7.75) 140(-12.55,7.25) 141(-12.55,6.75) 142(-12.55,6.25) 143(-12.55,5.75) 144(-12.55,5.25) 145(-12.55,4.75) 146(-12.55,4.25) 147(-12.55,3.75) 148(-12.55,3.25) 149(-12.55,2.75) 150(-12.55,2.25) 151(-12.55,1.75) 152(-12.55,1.25) 153(-12.55,0.75) 154(-12.55,0.25) 155(-12.55,-0.25) 156(-12.55,-0.75) 157(-12.55,-1.25) 158(-12.55,-1.75) 159(-12.55,-2.25) 160(-12.55,-2.75) 161(-12.55,-3.25) 162(-12.55,-3.75) 163(-12.55,-4.25) 164(-12.55,-4.75) 165(-12.55,-5.25) 166(-12.55,-5.75) 167(-12.55,-6.25) 168(-12.55,-6.75) 169(-12.55,-7.25) 170(-12.55,-7.75) 171(-12.55,-8.25) 172(-12.55,-8.75) 173(-12.55,-9.25) 174(-12.55,-9.75) 175(-12.55,-10.25) 176(-12.55,-10.75)
  silkscreen extent -11.57,-13.03 11.25,11.25, body extent -13,-13 13,13, height 1.73
SW-SMD_L6.1-W3.5-LS8.0 [mm]
  rect 1.5x1.5 smd: 1(3.989,0) 2(-3.811,0)
  silkscreen extent -2.87,-1.85 3.1,1.85, body extent -3.85,-1.82 4.15,1.88, height 3
TF-SMD_TF-PUSH [mil]
  rect 27.6x63 smd: 1(88.6,208.7) 2(45.3,208.7) 3(2,208.7) 4(-41.3,208.7) 5(-84.6,208.7) 6(-127.9,208.7) 7(-171.2,208.7) 8(-214.5,208.7) CD(-257.8,208.7)
  rect 47.2x59.1 smd: 10(-305.1,169.3)
  rect 47.2x86.6 smd: 11(-305.1,-208.7) 12(305.2,-208.7)
  rect 63x59.1 smd: 13(269.7,169.3)
  silkscreen extent -286,-382 315,209, body extent -320,-385 320,213, height 71
TRIM_PVG3A200C01R00 [mm]
  rect 1.1x0.9 smd: 1(1.15,-1.65) 3(-1.15,-1.65)
  rect 1.4x0.9 smd: 2(0,1.65)
  silkscreen extent -1.8,-1.92 2.72,1.7, body extent -1.8,-1.8 1.8,1.8, height 2
TSOP-54_L22.2-W10.2-P0.80-LS11.8-BL [mil]
  oval 19.7x70.9 smd: 1(-409.5,-222.2) 2(-378,-222.2) 3(-346.5,-222.2) 4(-315,-222.2) 5(-283.5,-222.2) 6(-252,-222.2) 7(-220.5,-222.2) 8(-189,-222.2) 9(-157.5,-222.2) 10(-126,-222.2) 11(-94.5,-222.2) 12(-63,-222.2) 13(-31.5,-222.2) 14(0,-222.2) 15(31.5,-222.2) 16(63,-222.2) 17(94.5,-222.2) 18(126,-222.2) 19(157.5,-222.2) 20(189,-222.2) 21(220.5,-222.2) 22(252,-222.2) 23(283.5,-222.2) 24(314.9,-222.2) 25(346.4,-222.2) 26(377.9,-222.2) 27(409.4,-222.2) 28(409.4,222.1) 29(377.9,222.1) 30(346.4,222.1) 31(314.9,222.1) 32(283.5,222.1) 33(252,222.1) 34(220.5,222.1) 35(189,222.1) 36(157.5,222.1) 37(126,222.1) 38(94.5,222.1) 39(63,222.1) 40(31.5,222.1) 41(0,222.1) 42(-31.5,222.1) 43(-63,222.1) 44(-94.5,222.1) 45(-126,222.1) 46(-157.5,222.1) 47(-189,222.1) 48(-220.5,222.1) 49(-252,222.1) 50(-283.5,222.1) 51(-315,222.1) 52(-346.5,222.1) 53(-378,222.1) 54(-409.5,222.1)
  silkscreen extent -442,-228 440,183, body extent -436,-240 436,220, height 47

## Part data
BT1: library part bs-06-b4ak001, "Type:Battery base Operating Temperature:-25~85? Contact material:Phosphor bronze Contact coating:Tin plated Applicable battery specifications:CR2032"
C1 C2 C3 C4 C5 C6 C7 C8 C9 C10 C11 C12 C14 C15 C16 C17 C19 C20 C21 C23 C24 C25 C27 C28 C29 C30 C31 C33 C39 C40 C41 C42 C43 C45 C46 C47 C48 C49 C50 C51 C52 C53 C54 C55 C56 C57 C58 C61 C62 C63: library part "Cap 0402", "Capacitor SMD 0402"
C13 C18 C22 C26 C32 C34 C35 C36 C37 C38 C44: library part "Cap 0603", "Capacitor SMD 0603"
CN2 CN3 GPSUART I2C "UART LORA" "UART WIFI" UART_FC: "Pins Structure:1x4P Pitch:2.54mm Mounting Type:Surface Mount,Vertical Reference Series:XH Number of Pins:4P Number of Rows:1 Number of PINs Per Row:4 Row Spacing:- Current Rating:3A Contact Material:Brass Contact Plating:Tin Operating Temperature:-25?~+85"
D4: "Diode Configuration:Independent Voltage - Forward(Vf@If):550mV@3A Voltage - DC Reverse(Vr):40V Current - Rectified:3A Reverse Leakage Current (Ir):500uA@40V Operating Junction Temperature Range:-55?~+125? Operating Junction Temperature Range:-55?~+125?"
D5: "Diode Configuration:Standalone Voltage - Forward(Vf@If):450mV@1A Voltage - DC Reverse(Vr):40V Current - Rectified:1A Reverse Leakage Current (Ir):150uA@40V Non-Repetitive Peak Forward Surge Current:5A"
HC1 HC2: "Function:Parallel or Serial to Serial Voltage - Supply:2V~6V Voltage - Supply:2V~6V Clock Frequency:35MHz Number of Elements:1 Output Type:Complementary Series:74HC Pd - Power Dissipation:500mW Propagation Delay:28ns@6V,50pF Output Current:25mA Resolution"
IC2: "Memory Size:256Mbit Clock Frequency:166MHz Voltage - Supply:3V~3.6V Voltage - Supply:3V~3.6V Features:Auto precharge;Auto refresh;High-speed clock synchronization;Automatic column address generation Operating Temperature:0?~+70? Operating Temperature:0?~+"
IC3: "Interface:SPI Memory Size:256Mbit Clock Frequency:133MHz Voltage - Supply:2.7V~3.6V Voltage - Supply:2.7V~3.6V Standby Supply Current:10uA Program / Erase Cycles:100,000 cycles Write Cycle Time (tWC):- Page Programming Time (Tpp):700us Block Erase Time(tB"
J1: "SX1268 433/470MHz SPI SMD LoRa Module"
J2: "1 POS Vertical SMD Small form factor with big performance through 6 GHz connector,MHF, RF, micro-coaxial MHF I Receptacle"
L1: library part 2.2uH
L2 L3 L4: library part "LED 0805 Trang", "Dán"
P1: "Header, 4-Pin"
Q1: "Number:1 P-Channel Drain to Source Voltage:20V Current - Continuous Drain(Id):3.7A RDS(on):65mO@4.5V Pd - Power Dissipation:1.3W Gate Threshold Voltage (Vgs(th)):1.2V Gate Charge(Qg):12nC Input Capacitance(Ciss):633pF Reverse Transfer Capacitance (Crss@Vd"
Q2 Q3: "type:NPN Current - Collector(Ic):200mA Collector - Emitter Voltage VCEO:40V Pd - Power Dissipation:350mW DC Current Gain:100 DC Current Gain:100 Transition frequency(fT):300MHz Current - Collector Cutoff:50nA Vce Saturation(VCE(sat)):300mV Operating Tempe"
R1 R2 R3 R4 R5 R6 R7 R10 R11 R12 R13 R14 R15 R16 R17 R18 R19 R20 R21 R22 R23 R24 R25 R26 R29 R30 R32 R33 R34 R35 R36 R37 R38 R39 R40 R41 R42 R43 R45 R46 R47 R48 R49 R50 R51 R52 R53 R54 R55 R56: library part "RES 0402", "RES SMD 0402"
R27 R28: library part "RES 0603", "RES SMD 0603"
"SD CARD": library part "tf push", "Card Connection Mode:Push-Push Card Type:MicroSD Card (TF Card) Connector Type:Connector and Ejector Additional Card Detection Pins:Yes Supplementary Features:- Height Above Board:2mm Operating Temperature:-25?~+85? Operating Temperature:-25?~+85? Rated V"
SW1 SW2 SW3: "Circuit:SPST Actuator Style:Rectangular Button Operating Force:1.6N Mounting Type:Surface Mount,Vertical Length:6.05mm Width:3.5mm Switch Height:2.5mm with Bracket:Without Bracket Contact Current:50mA Voltage Rating:12V Actuator/Cap Color:White With Lamp:"
U2: "Output Configuration:Positive Voltage - Supply:6V Output Voltage:3.3V Output Voltage:3.3V Output Current:1A Power Supply Rejection Ratio (PSRR):60dB@(100Hz) Voltage Dropout:400mV@(1A) standby current:220uA Noise:- Features:Input under-voltage protection;O"
U3: "Locking Feature:Flip-Top Contact Type:Double-Sided Contacts, Top and Bottom Entry Number of Contacts:10P Pitch:0.5mm Mounting Type:Surface Mount, Right Angle FFC, FCB Thickness:0.3mm FFC, FCB Thickness:0.3mm Height Above Board:2mm Contact Material:Phospho"
U4: "Accelerometer Sensing Axis:X,Y,Z Acceleration Measurement Range (MAX):±16g Acceleration Measurement Range (MAX):±16g Gyroscope Sensing Axis:X,Y,Z Gyroscope Measurement Range (MAX):±2000dps Gyroscope Measurement Range (MAX):±2000dps Sensor Type:IMU (accele"
"USB 2": "USB Connectors 24 Receptacle 1 8.94*7.3mm RoHS"
VR1 VR2: "20 Ohms 0.25W, 1/4W J Lead Surface Mount Trimmer Potentiometer Cermet 1.0 Turn Top Adjustment"
X2: "Type:Crystal Oscillator Frequency:32.768kHz Normal temperature Frequency Tolerance:±20ppm Normal temperature Frequency Tolerance:±20ppm Load Capacitance:12.5pF Equivalent Series Resistance(ESR):70kO Operating Temperature:-40?~+85? Operating Temperature:-4"

## Via types
v1: diameter 0.4, hole 0.3, Top Layer to Bottom Layer, 4 vias

## Nets (pads, with @x,y where several pads share a name; then routed paths per layer and width w, separated by ;. In a path a pad name is that pad's centre, name@x,y a point inside that pad or via, vN(x,y) a via of type N, cw(c..) or ccw(c..) an arc to the next point about the centre after c; other vN are vias at no path point)
3V3: "SD CARD.4" "UART LORA.1" "UART WIFI.1" *1.1 *2.1 *3.1 *4.1 C1.1 C2.1 C3.1 C4.1 C5.1 C6.1 C7.1 C8.1 C9.1 C10.1 C11.1 C12.1 C15.1 C16.1 C17.1 C18.2 C19.2 C20.1 C21.1 C22.1 C23.1 C26.2 C27.1 C28.1 C29.1 C30.1 C32.1 C39.2 C46.2 C49.2 C50.2 C51.2 C52.2 C53.1 C54.1 C61.1 C62.1 CN2.3 CN3.3 GPSUART.1 HC1.16 HC2.16 I2C.1 IC1.15 IC1.23 IC1.36 IC1.38 IC1.49 IC1.62 IC1.72 IC1.82 IC1.91 IC1.103 IC1.114 IC1.127 IC1.136 IC1.149 IC1.159 IC1.172 IC2.1 IC2.3 IC2.9 IC2.14 IC2.27 IC2.43 IC2.49 IC3.2 J1.9-VCC J1.10-VCC P1.1 P5.2 P6.2 P7.2 P8.2 R1.2 R2.2 R4.1 R5.1 R6.2 R7.2 R10.2 R11.2 R12.2 R13.2 R14.2 R15.2 R16.2 R17.2 R22.2 R27.1 R28.1 R29.1 R42.2 rgb.4 SW1.1 U1.7 U1.10 U2.3 U3.10 U4.5 U4.8 UART_FC.1 VR1.3 VR2.3 | length 902
  Top Layer w0.254: 16.637,10.792 17.716,10.794 ; C54.1 17.716,10.794 ; U2.3 C18.2 C19.2 P1.1 ; C2.1 38.182,17.456 ; R16.2 41.359,4.357 ; IC1.172 45.703,14.643 ; IC1.159 C10.1 ; IC1.149 C3.1 ; IC1.136 C16.1 C3.1 ; C7.1 IC1.127 45.703,14.643 ; C12.1 50.766,9.18 ; IC1.114 52.398,30.126 ; C6.1 C5.1 ; R27.1 R42.2 51.99,3.342 ; C11.1 54.798,9.18 ; IC1.23 54.798,9.18 ; IC1.103 58.014,32.025 ; VR1.3 64.14,0.805 ; R7.2 68.157,4.297 ; IC1.91 64.425,34.192 ; C4.1 67.141,39.715 ; C39.2 C32.1 ; R11.2 C32.1 ; IC1.62 C9.1 72.972,23.241 ; IC1.82 64.538,31.181 ; U1.7 71.005,42.59 ; U1.10 68.179,45.451 ; U4.5 C15.1 68.157,4.297 ; U4.8 C1.1 C26.2 IC3.2 ; R10.2 69.794,46.296 ; C20.1 70.731,26.063 ; R6.2 R5.1 ; C29.1 C8.1 IC1.49 65.161,14.626 ; C27.1 IC2.9 86.291,26.226 ; C23.1 C21.1 72.822,37.032 ; C46.2 J1.10-VCC ; IC2.27 90.144,12.76 ; *3.1 J1.9-VCC ; IC2.49 C53.1 90.071,29.506 ; 118.57,6.584 110.995,7.2 ; GPSUART.1 110.995,7.2 ; 118.57,43.876 90.071,29.506 ; 17.716,10.794 18.584,11.223 SW1.1 38.182,17.456 ; 38.182,17.456 R1.2 R2.2 41.359,4.357 ; 38.182,17.456 R13.2 R28.1 R15.2 C10.1 ; C10.1 R12.2 R14.2 C3.1 ; 41.359,4.357 51.99,3.342 ; 45.703,14.643 51.168,14.68 ; 50.766,9.18 IC1.15 51.168,14.68 ; 50.766,9.18 52.11,9.18 ; 51.168,14.68 65.161,14.626 ; 51.168,14.68 52.091,26.264 ; 51.99,3.342 52.11,9.18 ; 52.091,26.264 64.728,26.142 ; 52.091,26.264 52.398,30.126 ; 52.11,9.18 54.798,9.18 ; 52.398,30.126 56.112,31.381 ; 56.112,31.381 57.953,31.337 ; 56.112,31.381 58.014,32.025 ; 57.953,31.337 58.014,32.025 ; 57.953,31.337 64.538,31.181 ; 58.014,32.025 64.425,34.192 ; 64.14,0.805 VR2.3 R29.1 J1.10-VCC ; 64.14,0.805 68.157,4.297 ; 64.425,34.192 72.822,37.032 ; 64.425,34.192 64.538,31.181 ; 64.538,31.181 64.728,26.142 ; 64.728,26.142 IC1.72 70.731,26.063 ; 64.728,26.142 65.161,14.626 ; C32.1 68.179,45.451 ; 68.179,45.451 69.794,46.296 ; 69.794,46.296 71.005,42.59 ; 70.731,26.063 72.972,23.241 ; 71.005,42.59 72.822,37.032 ; 72.972,23.241 C28.1 IC2.14 86.291,26.226 ; J1.9-VCC J1.10-VCC ; J1.9-VCC 75.72,-11.955 76.79,-10.347 *4.1 95.846,8.433 ; 86.291,26.226 IC2.43 C30.1 ; C30.1 90.144,12.76 ; C30.1 90.071,29.506 ; 90.144,12.76 R4.1 95.846,8.433 ; 95.846,8.433 110.995,7.2
  POWER w0.254: P1.1 49.791,-19.736 ; *2.1 49.791,-19.736 ; *3.1 49.791,-19.736
  Bottom Layer w0.254: P5.2 40.089,39.48 ; P1.1 40.089,39.48 ; 52.995,38.543 53.531,25.194 55.313,23.55 HC1.16 C61.1 HC2.16 ; CN2.3 *1.1 C51.2 55.633,2.715 ; R17.2 51.408,38.75 45.527,34.462 40.089,39.48 ; UART_FC.1 55.633,2.715 ; CN3.3 69.652,-4.905 ; C49.2 69.652,-4.905 ; I2C.1 74.466,-4.401 ; C52.2 *3.1 ; *4.1 74.466,-4.401 ; 55.633,2.715 59.417,-1.857 ; 59.417,-1.857 74.466,-4.401 ; 59.417,-1.857 C50.2 69.652,-4.905
5V: "USB 2.A4_B9" "USB 2.B4_A9" D2.4 L4.1 UU.4
"ADC VBAT": C43.1 IC1.57 R34.1 R36.2 | length 1.3
  Top Layer w0.254: R36.2 C43.1
ADC_AIL: C52.1 C58.2 CN3.1 IC1.40 | length 8.4
  Bottom Layer w0.254: C58.2 74.786,-32.919 ; CN3.1 74.786,-32.919 ; C52.1 74.786,-32.919
ADC_ELE: C49.1 C55.2 CN3.2 IC1.50 | length 31.6
  Bottom Layer w0.254: CN3.2 C55.2 C49.1
ADC_PIT: C51.1 C57.2 CN2.2 IC1.34 | length 31.7
  Bottom Layer w0.254: C51.1 C57.2 CN2.2
ADC_RUD: C50.1 C56.2 CN2.1 IC1.35 | length 31.8
  Bottom Layer w0.254: CN2.1 C56.2 C50.1
ADC_VR1: IC1.32 VR1.2
ADC_VR2: IC1.56 VR2.2 | length 31.3
  Top Layer w0.254: IC1.56 67.689,18.065 70.539,18.065 72.639,15.965 73.539,15.965 76.389,13.115 77.739,13.115 79.089,11.765 79.089,9.815 78.789,9.515 76.239,9.515 74.589,7.865 74.589,6.815 69.789,2.015 68.739,2.015 VR2.2
ANT: J1.21-ANT J2.1 | length 3
  Top Layer w0.254: J2.1 J1.21-ANT
BOOT0: C25.1 IC1.166 R3.2 SW1.2 | length 8.8
  Top Layer w0.254: C25.1 R3.2 SW1.2
CSB: IC1.154 U4.12
"CTRL LED": IC1.2 Uu1.2
D+: "USB 2.A6" "USB 2.B6" D2.2 U1.1 | length 10
  Top Layer w0.254: 61.988,50.368 61.989,49.715 61.989,49.565 62.139,49.415 ; 62.988,50.368 63.039,49.715 63.039,49.565 62.889,49.415 62.139,49.415 ; U1.1 D2.2 62.139,49.415
D-: "USB 2.A7" "USB 2.B7" D2.3 U1.2 | length 16.3
  Top Layer w0.254: D2.3 60.939,44.315 61.389,43.865 64.089,43.865 U1.2 65.289,43.865 65.739,43.865 65.889,44.015 65.889,44.615 63.639,46.865 63.489,46.865 63.489,49.715 63.488,50.368 63.489,50.915 63.489,51.215 63.339,51.365 62.589,51.365 62.439,51.215 62.439,50.915 62.488,50.368
"DCMI VSYNC": IC1.165
DISP: IC1.83 rgb.31
"FMC A0": IC1.16 IC2.23
"FMC A1": IC1.17 IC2.24
"FMC A2": IC1.18 IC2.25
"FMC A3": IC1.19 IC2.26
"FMC A4": IC1.20 IC2.29
"FMC A5": IC1.21 IC2.30
"FMC A6": IC1.60 IC2.31
"FMC A7": IC1.63 IC2.32
"FMC A8": IC1.64 IC2.33
"FMC A9": IC1.65 IC2.34
"FMC A10": IC1.66 IC2.22
"FMC A11": IC1.67 IC2.35
"FMC A12": IC1.106 IC2.36
"FMC BA0": IC1.108 IC2.20
"FMC BA1": IC1.109 IC2.21
"FMC D0": IC1.104 IC2.2
"FMC D1": IC1.105 IC2.4
"FMC D2": IC1.142 IC2.5
"FMC D3": IC1.143 IC2.7
"FMC D4": IC1.68 IC2.8
"FMC D5": IC1.69 IC2.10
"FMC D6": IC1.70 IC2.11
"FMC D7": IC1.73 IC2.13 | length 10.2
  Top Layer w0.254: IC1.73 67.689,26.615 71.439,26.615 71.589,26.765 74.439,26.765 75.339,25.865 76.239,25.865 IC2.13
"FMC D8": IC1.74 IC2.42
"FMC D9": IC1.75 IC2.44
"FMC D10": IC1.76 IC2.45 | length 28.1
  Top Layer w0.254: IC1.76 67.689,28.115 68.289,28.115 71.439,31.265 71.439,31.415 72.489,32.465 73.539,32.465 75.189,34.115 75.189,35.165 75.939,35.915 78.939,35.915 86.589,28.265 87.639,28.265 IC2.45
"FMC D11": IC1.77 IC2.47
"FMC D12": IC1.78 IC2.48
"FMC D13": IC1.96 IC2.50
"FMC D14": IC1.97 IC2.51
"FMC D15": IC1.98 IC2.53
"FMC NBL0": IC1.169 IC2.15
"FMC NBL1": IC1.170 IC2.39
"FMC SDCKE0": IC1.43 IC2.37
"FMC SDCLK": IC1.112 IC2.38
"FMC SDNCAS": IC1.160 IC2.17
"FMC SDNE0": IC1.44 IC2.19 R5.2
"FMC SDNRAS": IC1.59 IC2.18 | length 10.6
  Top Layer w0.254: IC1.59 67.689,19.565 70.839,19.565 71.739,20.465 74.139,20.465 75.189,21.515 76.239,21.515 IC2.18
"FMC SDNWE": IC1.46 IC2.16
GND: "SD CARD.6" "SD CARD.10" "SD CARD.11" "SD CARD.12" "SD CARD.13" "UART LORA.4" "UART WIFI.4" "USB 2.A1_B12" "USB 2.B1_A12" "USB 2.S1" "USB 2.S2" "USB 2.S3" "USB 2.S4" *.1 BT1.2 BUTTOM.2 C1.2 C2.2 C3.2 C4.2 C5.2 C6.2 C7.2 C8.2 C9.2 C10.2 C11.2 C12.2 C13.1 C14.1 C15.2 C16.2 C17.2 C18.1 C19.1 C20.2 C21.2 C22.2 C23.2 C24.2 C25.2 C26.1 C27.2 C28.2 C29.2 C30.2 C31.2 C32.2 C33.2 C34.2 C35.2 C36.2 C37.1 C38.2 C39.1 C40.2 C41.2 C42.2 C43.2 C44.2 C46.1 C47.1 C48.1 C53.2 C54.2 C55.1 C56.1 C57.1 C58.1 C61.2 C62.2 C63.2 CN2.4 CN2.5 CN2.6 CN3.4 CN3.5 CN3.6 D2.1 GPSUART.4 HC1.8 HC1.10 HC1.15 HC2.3 HC2.4 HC2.5 HC2.6 HC2.8 HC2.15 I2C.4 IC1.14 IC1.22 IC1.37 IC1.48 IC1.61 IC1.71 IC1.90 IC1.102 IC1.113 IC1.126 IC1.135 IC1.148 IC1.158 IC2.6 IC2.12 IC2.28 IC2.41 IC2.46 IC2.52 IC2.54 IC3.10 J1.1-GND J1.2-GND J1.3-GND J1.4-GND J1.5-GND J1.11-GND J1.12-GND J1.20-GND J1.22-GND J2.2 J2.3 L2.2 P1.2 Q2.1 Q3.1 R3.1 R21.1 R26.2 R35.1 R36.1 R39.1 R40.1 R43.1 R45.1 R46.1 R47.1 R48.1 R49.1 R50.1 R51.2 R52.2 R53.1 R54.1 R55.2 R56.2 rgb.3 rgb.29 rgb.36 rgb.41 rgb.42 SW2.2 U1.3 U2.2 U3.4 U3.8 U3.9 U3.11 U3.12 U4.6 U4.7 UART_FC.4 Uu1.4 UU.2 VR1.1 VR2.1
"HS ULPI D0": IC1.47
"HS ULPI D7": IC1.163
"HS ULPI DIR": IC1.13
"HS ULPI NXT": IC1.45
"I2C4 SCL": I2C.2 IC1.100 R17.1 U3.7
"I2C4 SDA": I2C.3 IC1.101 R22.1 U3.6
INT1: IC1.157 U4.4
"INT LCD": IC1.1 U3.5
KEYSTATUS: IC1.147 R33.2 R35.2 | length 1.5
  Top Layer w0.254: R35.2 R33.2
LED: IC1.8 L3.2 | length 9.2
  Top Layer w0.254: L3.2 40.239,10.115 40.839,9.515 47.139,9.515 47.289,9.665 47.289,10.265 IC1.8
LORA_BUSY: IC1.99 J1.14-BUSY
LORA_DIO1: IC1.54 J1.13-DIO1
LORA_MISO: IC1.140 J1.16-MISO U4.1
LORA_MOSI: IC1.141 J1.17-MOSI
LORA_NRST: IC1.55 J1.15-NRESET R42.1
LORA_NSS: IC1.138 J1.19-NSS
LORA_RXEN: IC1.152 J1.6-RXEN
LORA_SCK: IC1.139 J1.18-SCK U4.13
LORA_TXEN: IC1.107 J1.7-TXEN
"LTDC B0": IC1.3 rgb.21
"LTDC B1": IC1.155 rgb.22
"LTDC B2": IC1.118 rgb.23
"LTDC B3": IC1.119 rgb.24
"LTDC B4": IC1.173 rgb.25
"LTDC B5": IC1.174 rgb.26
"LTDC B6": IC1.175 rgb.27
"LTDC B7": IC1.176 rgb.28
"LTDC CLK": IC1.111 rgb.30
"LTDC DE": IC1.28 rgb.34
"LTDC G0": IC1.4 rgb.13
"LTDC G1": IC1.5 rgb.14
"LTDC G2": IC1.128 rgb.15
"LTDC G3": IC1.153 rgb.16
"LTDC G4": IC1.130 rgb.17
"LTDC G5": IC1.131 rgb.18
"LTDC G6": IC1.132 rgb.19
"LTDC G7": IC1.133 rgb.20 | length 35.2
  Top Layer w0.254: rgb.20 IC1.133
"LTDC HS": IC1.12 rgb.32
"LTDC R0": IC1.156 rgb.5
"LTDC R1": IC1.42 rgb.6
"LTDC R2": IC1.85 rgb.7
"LTDC R3": IC1.86 rgb.8
"LTDC R4": IC1.87 rgb.9
"LTDC R5": IC1.88 rgb.10
"LTDC R6": IC1.89 rgb.11
"LTDC R7": IC1.110 rgb.12
"LTDC VS": IC1.11 rgb.33
Net*5_2: *5.2 C45.2 D5.2 Q3.3 | length 11.1
  Top Layer w0.254: *5.2 C45.2 18.489,53.079 ; Q3.3 18.489,53.079 ; D5.2 18.489,53.079
Net*_2: *.2 R30.2 | length 8.7
  Top Layer w0.254: R30.2 *.2
NetC63_1: C63.1 Uu1.5 | length 2
  Top Layer w0.254: C63.1 12.639,19.865 12.789,20.015 12.789,20.165 13.089,20.465 Uu1.5
NetD4_2: D4.2 R33.1 SW3.1 | length 9.9
  Top Layer w0.254: D4.2 37.389,54.815 38.589,53.615 39.789,53.615 40.239,54.065 R33.1 SW3.1
NetHC1_9: HC1.9 HC2.10 | length 9.6
  Bottom Layer w0.254: HC1.9 57.039,14.615 58.839,16.415 63.939,16.415 64.389,15.965 HC2.10
NetIC3_3: IC3.3 R4.2 | length 12.2
  Top Layer w0.254: IC3.3 78.189,8.315 88.689,8.315 R4.2
NetL2_1: L2.1 R27.2 | length 7.2
  Top Layer w0.254: R27.2 54.189,-1.735 54.639,-1.285 54.639,2.765 53.889,3.515 L2.1
NetL3_1: L3.1 R28.2 | length 3.7
  Top Layer w0.254: L3.1 39.789,13.265 39.789,15.665 R28.2
NetL4_2: L4.2 R37.2
NetQ1_1: Q1.1 Q2.3 R32.1 | length 4.7
  Top Layer w0.254: Q1.1 R32.1 Q2.3
NetQ2_2: Q2.2 R38.1 R40.2
NetQ3_2: Q3.2 R41.1 | length 2.1
  Top Layer w0.254: Q3.2 R41.1
NetR18_2: "SD CARD.1" R18.2 | length 4.2
  Top Layer w0.254: 16.637,7.493 R18.2
NetR19_2: "SD CARD.2" R19.2 | length 1.8
  Top Layer w0.254: 16.637,8.593 R19.2
NetR20_2: "SD CARD.3" R20.2 | length 4.5
  Top Layer w0.254: 16.637,9.693 R20.2
NetR21_2: "USB 2.A5" R21.2 | length 2.1
  Top Layer w0.254: 63.988,50.368 R21.2
NetR23_2: "SD CARD.5" R23.2 | length 1.9
  Top Layer w0.254: 16.637,11.892 R23.2
NetR24_2: "SD CARD.7" R24.2 | length 1.8
  Top Layer w0.254: 16.637,14.092 R24.2
NetR25_2: "SD CARD.8" R25.2 | length 1.9
  Top Layer w0.254: 16.637,15.192 R25.2
NetR26_1: "USB 2.B5" R26.1 | length 2.1
  Top Layer w0.254: 60.988,50.368 R26.1
NetR37_1: R37.1 UU.1 | length 3.4
  Top Layer w0.254: UU.1 56.889,45.515 56.889,47.165 R37.1
NetR39_2: R39.2 UU.5 | length 1.7
  Top Layer w0.254: UU.5 R39.2
"OSC32 IN": C35.1 IC1.9 X2.2 | length 6.6
  Top Layer w0.254: X2.2 C35.1 46.239,7.865 47.889,9.515 47.889,10.265 IC1.9
"OSC32 OUT": C36.1 IC1.10 X2.1 | length 10.6
  Top Layer w0.254: X2.1 44.139,5.015 46.539,5.015 48.639,7.115 C36.1 48.939,8.015 48.339,8.615 48.339,10.265 IC1.10
"OSC IN": C34.1 IC1.29 X1.3 | length 15.8
  Top Layer w0.254: X1.3 55.989,-3.085 55.389,-2.485 55.389,6.365 55.689,6.665 C34.1 56.589,7.865 57.789,9.065 57.789,10.265 IC1.29
"OSC OUT": C38.1 IC1.30 X1.1 | length 16.2
  Top Layer w0.254: IC1.30 58.498,7.208 ; X1.1 58.498,7.208 ; C38.1 58.498,7.208
PA1: IC1.41
PA5: IC1.51
PA6: IC1.52
PA7: IC1.53
PA9: IC1.120 U1.9
PA10: IC1.121 U1.8
PA11: IC1.122
PA12: IC1.123
PA13: IC1.124 P1.4
PA14: IC1.137 P1.3
PB2: IC1.58 IC3.16
PB3: IC1.161 R16.1 R18.1
PB4: IC1.162 R15.1 R19.1
PB6: IC1.164 IC3.7 R6.1
PB8: GPSUART.3 IC1.167
PB9: GPSUART.2 IC1.168
PB10: "UART WIFI.2" IC1.79
PB11: "UART WIFI.3" IC1.80
PB12: IC1.92 UART_FC.3
PB13: IC1.93 UART_FC.2
PB14: IC1.94 R12.1 R24.1 | length 20.7
  Top Layer w0.254: R24.1 R12.1
PB15: IC1.95 R11.1 R25.1
PC1: IC1.33
PC6: "UART LORA.2" IC1.115
PC7: "UART LORA.3" IC1.116
PC8: IC1.117
PD2: IC1.144 R41.2
PD3: BUTTOM.1 C37.2 IC1.145 R10.1 | length 6.6
  Top Layer w0.254: R10.1 C37.2 BUTTOM.1
PD4: IC1.146 R38.2 | length 2.5
  Top Layer w0.254: R38.2 40.689,28.115 40.689,27.965 40.989,27.665 41.439,27.665 IC1.146
PD6: IC1.150 R13.1 R23.1
PD7: IC1.151 R14.1 R20.1
"PDR ON": IC1.171 R1.1 | length 8.2
  Top Layer w0.254: R1.1 37.989,12.365 38.739,11.615 40.539,11.615 40.689,11.765 40.689,14.765 40.989,15.065 41.439,15.065 IC1.171
PF6: IC1.24 IC3.1 | length 24
  Top Layer w0.254: IC1.24 55.389,11.465 55.389,11.915 55.989,12.515 65.589,12.515 66.039,12.065 76.989,12.065 IC3.1
PF7: IC1.25 IC3.9
PF8: IC1.26 IC3.15 | length 32.5
  Top Layer w0.254: v1(56.139,9.515) 56.289,9.665 56.289,10.265 IC1.26 ; v1(85.839,9.515) 86.439,10.115 IC3.15
  POWER w0.254: v1(56.139,9.515) v1(85.839,9.515)
PF9: IC1.27 IC3.8
PH7: IC1.84 U3.3
PH14: HC1.2 HC2.2 IC1.129
PI3: HC1.1 HC2.1 IC1.134
PI8: HC2.9 IC1.7
RESET: C24.1 IC1.31 R2.1 SW2.1 | length 3.7
  Top Layer w0.254: SW2.1 C24.1 R2.1
"SW A": *2.2 HC1.11 R48.2 | length 5.2
  Top Layer w0.254: R48.2 *2.2
"SW D": *3.2 HC2.14 R45.2 | length 5.6
  Top Layer w0.254: *3.2 R45.2
"SW E": *4.2 HC2.13 R46.2
"SW LED": Diode1.2 L1.2 Uu1.3 | length 5.6
  Top Layer w0.254: Uu1.3 Diode1.2 L1.2
SW_B1: HC1.13 P5.1 R52.1 | length 28.5
  Bottom Layer w0.254: P5.1 R52.1 HC1.13
SW_B2: HC1.14 P5.3 R50.2 | length 2.8
  Bottom Layer w0.254: R50.2 P5.3
SW_C1: HC1.3 P6.1 R56.1 | length 2.5
  Bottom Layer w0.254: P6.1 R56.1
SW_C2: HC1.4 P6.3 R54.2 | length 2.5
  Bottom Layer w0.254: R54.2 P6.3
SW_F1: HC1.5 P7.1 R51.1 | length 2.8
  Bottom Layer w0.254: R51.1 P7.1
SW_F2: HC1.6 P7.3 R49.2 | length 2.9
  Bottom Layer w0.254: R49.2 P7.3
SW_G1: HC2.11 P8.1 R55.1 | length 2.6
  Bottom Layer w0.254: P8.1 R55.1
SW_G2: HC2.12 P8.3 R53.2 | length 2.6
  Bottom Layer w0.254: P8.3 R53.2
SW_H: *1.2 HC1.12 R47.2 | length 5.4
  Top Layer w0.254: R47.2 *1.2
VBAT: *5.1 C13.2 C14.2 C44.1 C45.1 C47.2 D4.1 D5.1 L1.1 Q1.3 U2.1 Uu1.1 | length 46.7
  Top Layer w0.254: Uu1.1 C47.2 L1.1 ; C45.1 D5.1 19.81,48.544 ; U2.1 C14.2 C13.2 19.81,48.544 ; Q1.3 *5.1 19.81,48.544
VBATIN: C42.1 Q1.2 R30.1 R32.2 R34.2 SW3.2 UU.3 | length 23.1
  Top Layer w0.254: R30.1 SW3.2 ; Q1.2 46.135,45.542 ; R32.2 46.135,45.542 ; UU.3 C42.1 SW3.2 ; SW3.2 46.135,45.542
VCAP1: C40.1 IC1.81 | length 5.5
  Top Layer w0.254: IC1.81 67.689,30.665 v1(68.139,30.665) ; v1(71.889,30.665) C40.1
  POWER w0.254: v1(68.139,30.665) v1(71.889,30.665)
VCAP2: C41.1 IC1.125 | length 2.6
  Top Layer w0.254: IC1.125 47.289,36.515 47.289,37.265 47.739,37.715 C41.1
"VCC RTC": BT1.1 IC1.6
VDDA: C31.1 C33.1 IC1.39 R7.1 R29.2 | length 1.1
  Top Layer w0.254: C31.1 C33.1
VLED+: C48.2 Diode1.1 rgb.2 | length 4.2
  Top Layer w0.254: Diode1.1 C48.2
VLED-: R43.2 rgb.1 Uu1.6 | length 8.6
  Top Layer w0.254: rgb.1 R43.2 11.439,18.965 13.089,18.965 Uu1.6
pads on no net: "SD CARD.CD" "UART LORA.5" "UART LORA.6" "UART WIFI.5" "UART WIFI.6" "USB 2." "USB 2.A8" "USB 2.B8" GPSUART.5 GPSUART.6 HC1.7 HC2.7 I2C.5 I2C.6 IC2.40 IC3.4 IC3.5 IC3.6 IC3.11 IC3.12 IC3.13 IC3.14 J1.8-DIO2 P5.4 P5.5 P6.4 P6.5 P7.4 P7.5 P8.4 P8.5 rgb.35 rgb.37 rgb.38 rgb.39 rgb.40 U1.4 U1.5 U1.6 U2.4 U3.1 U3.2 U4.2 U4.3 U4.9 U4.10 U4.11 U4.14 UART_FC.5 UART_FC.6 X1.2 X1.4

## Keep-outs
Keep-Out Layer:
  the board outline again, w0.254